# Altium PCB PCB_Main_Board_v2.0.PcbDoc (part 1 of 5)
Units mil, origin at the board's own origin, x right, y up, seen from the top; angles counter-clockwise.
Board outline 1967.5 x 1574.8 mil, 4 copper layers (Top Layer, Mid Layer 1, Mid Layer 2, Bottom Layer), stack 61.811 mil thick; 225 components, 129 nets, 854 pads, 286 vias.
Unrouted connection lines stored in the file: 2.
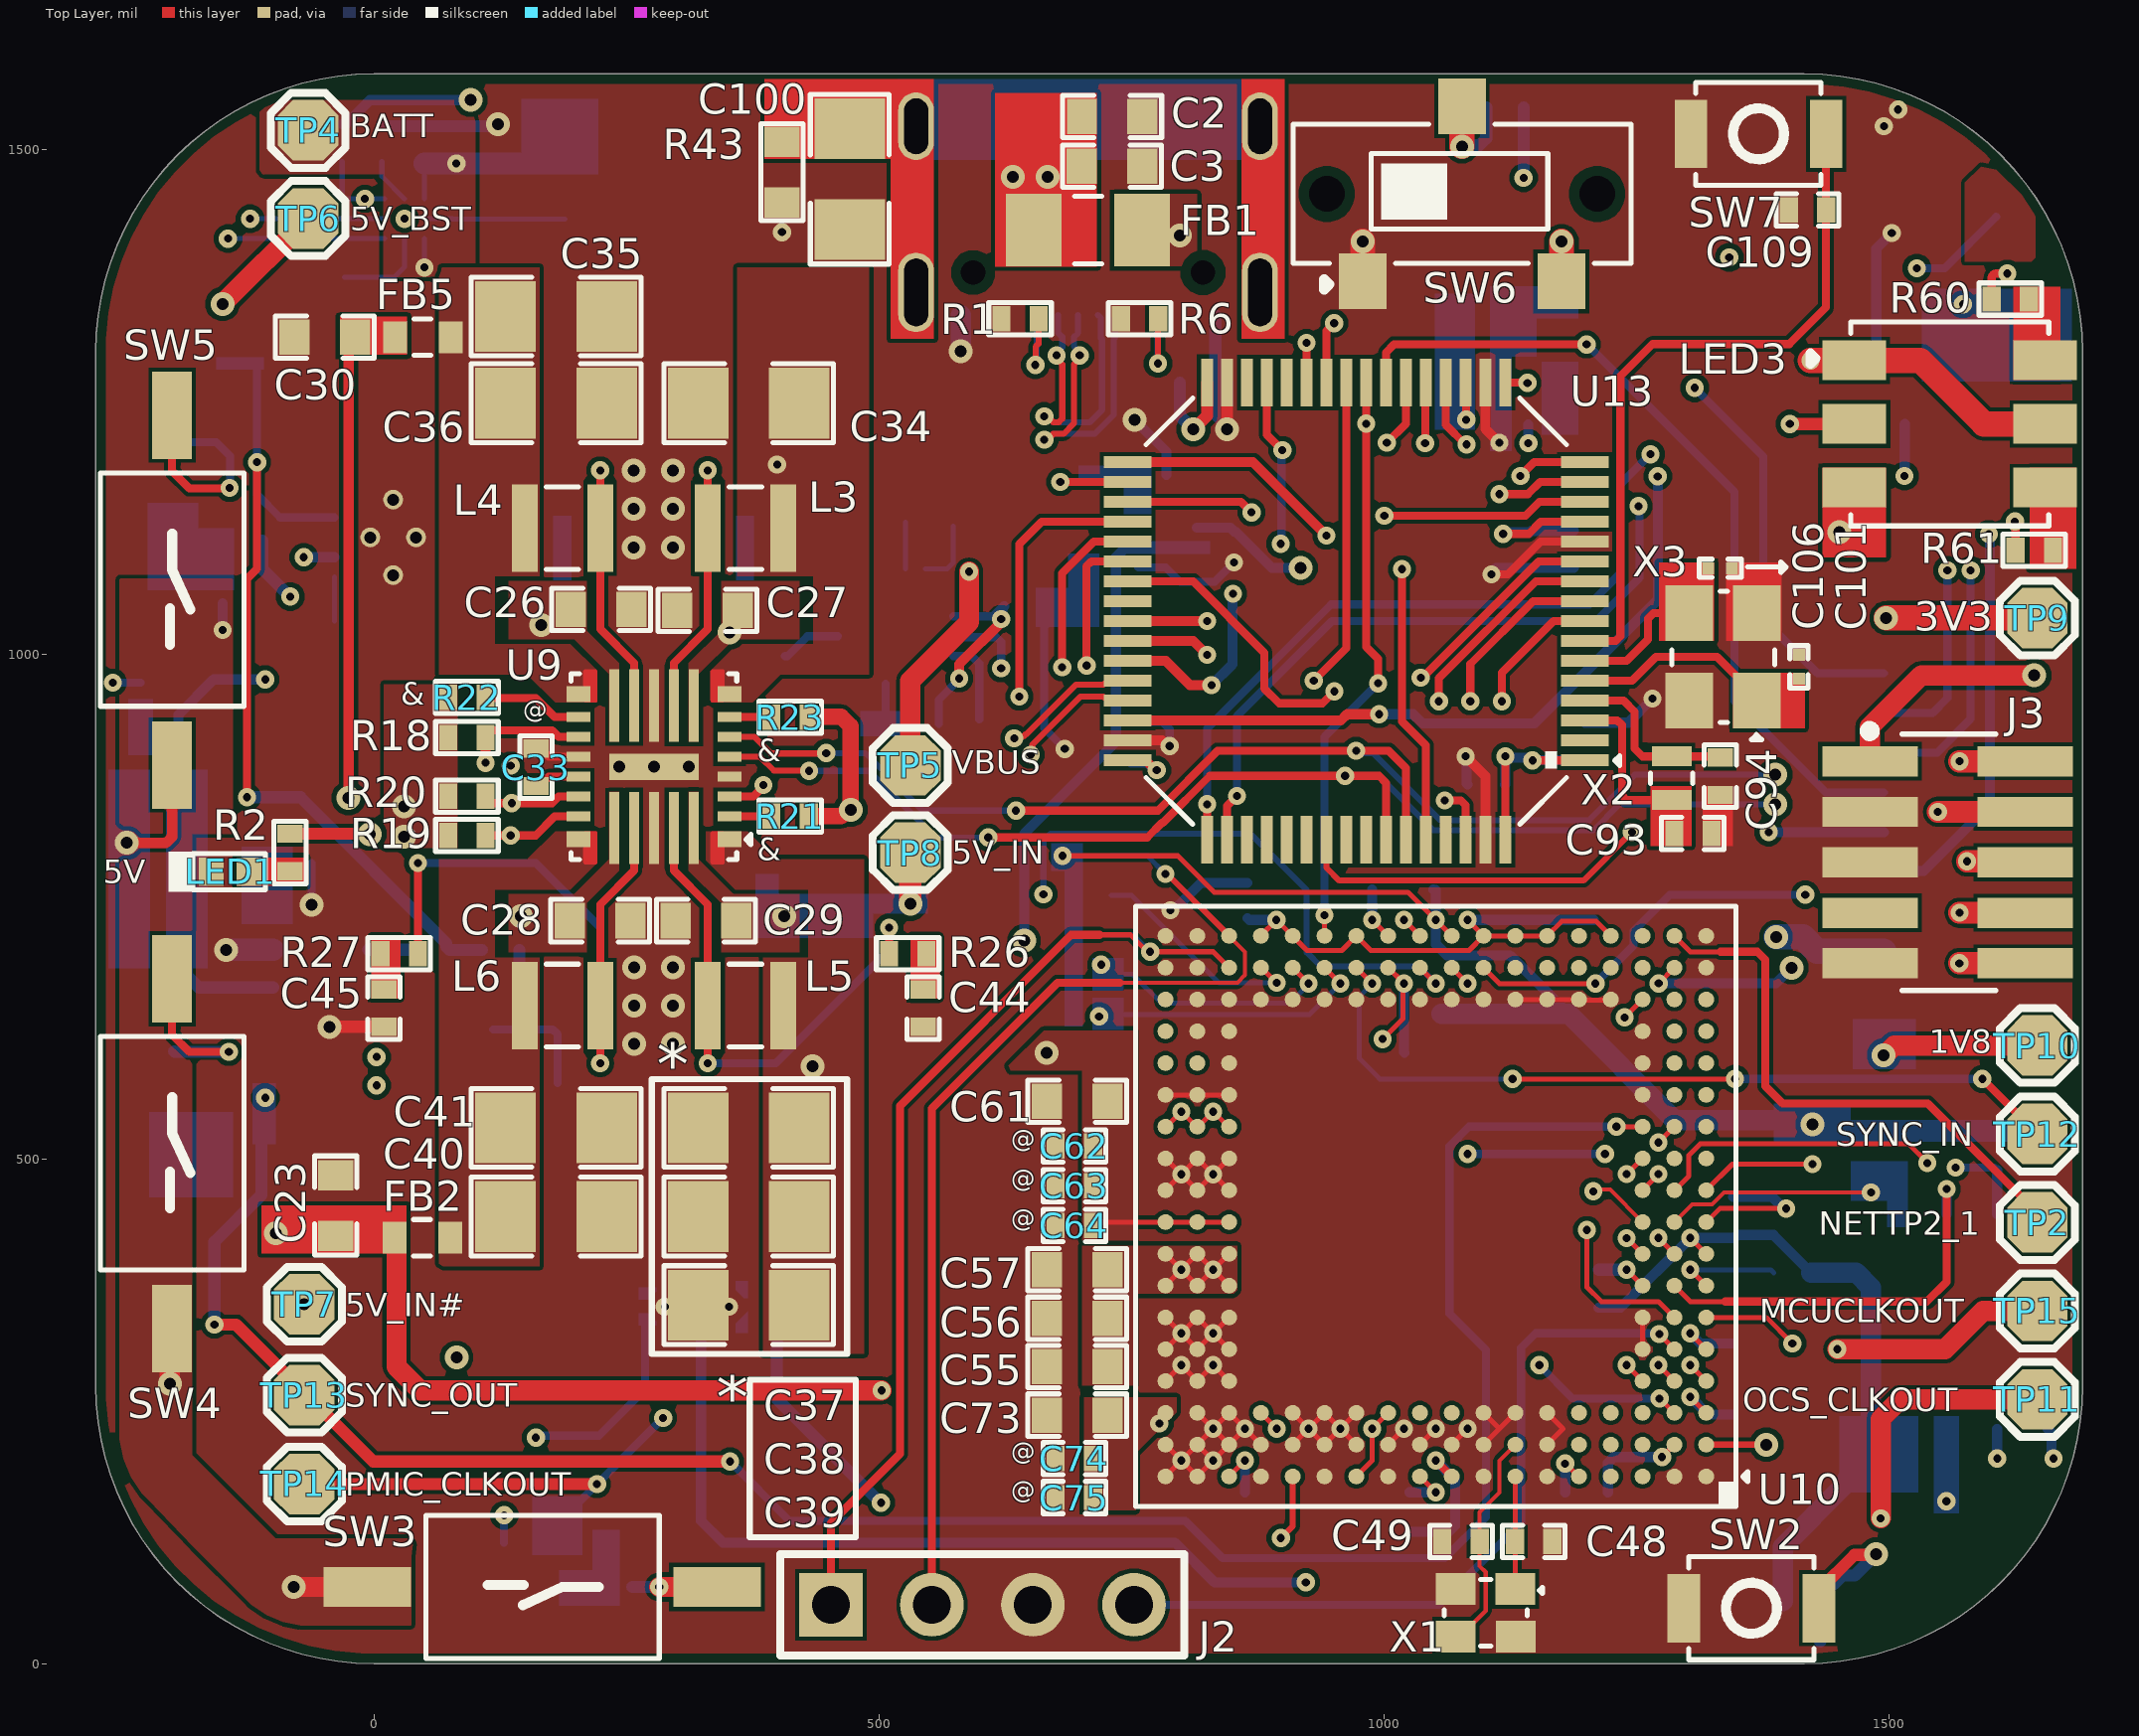
[diagram p0: Top Layer view]
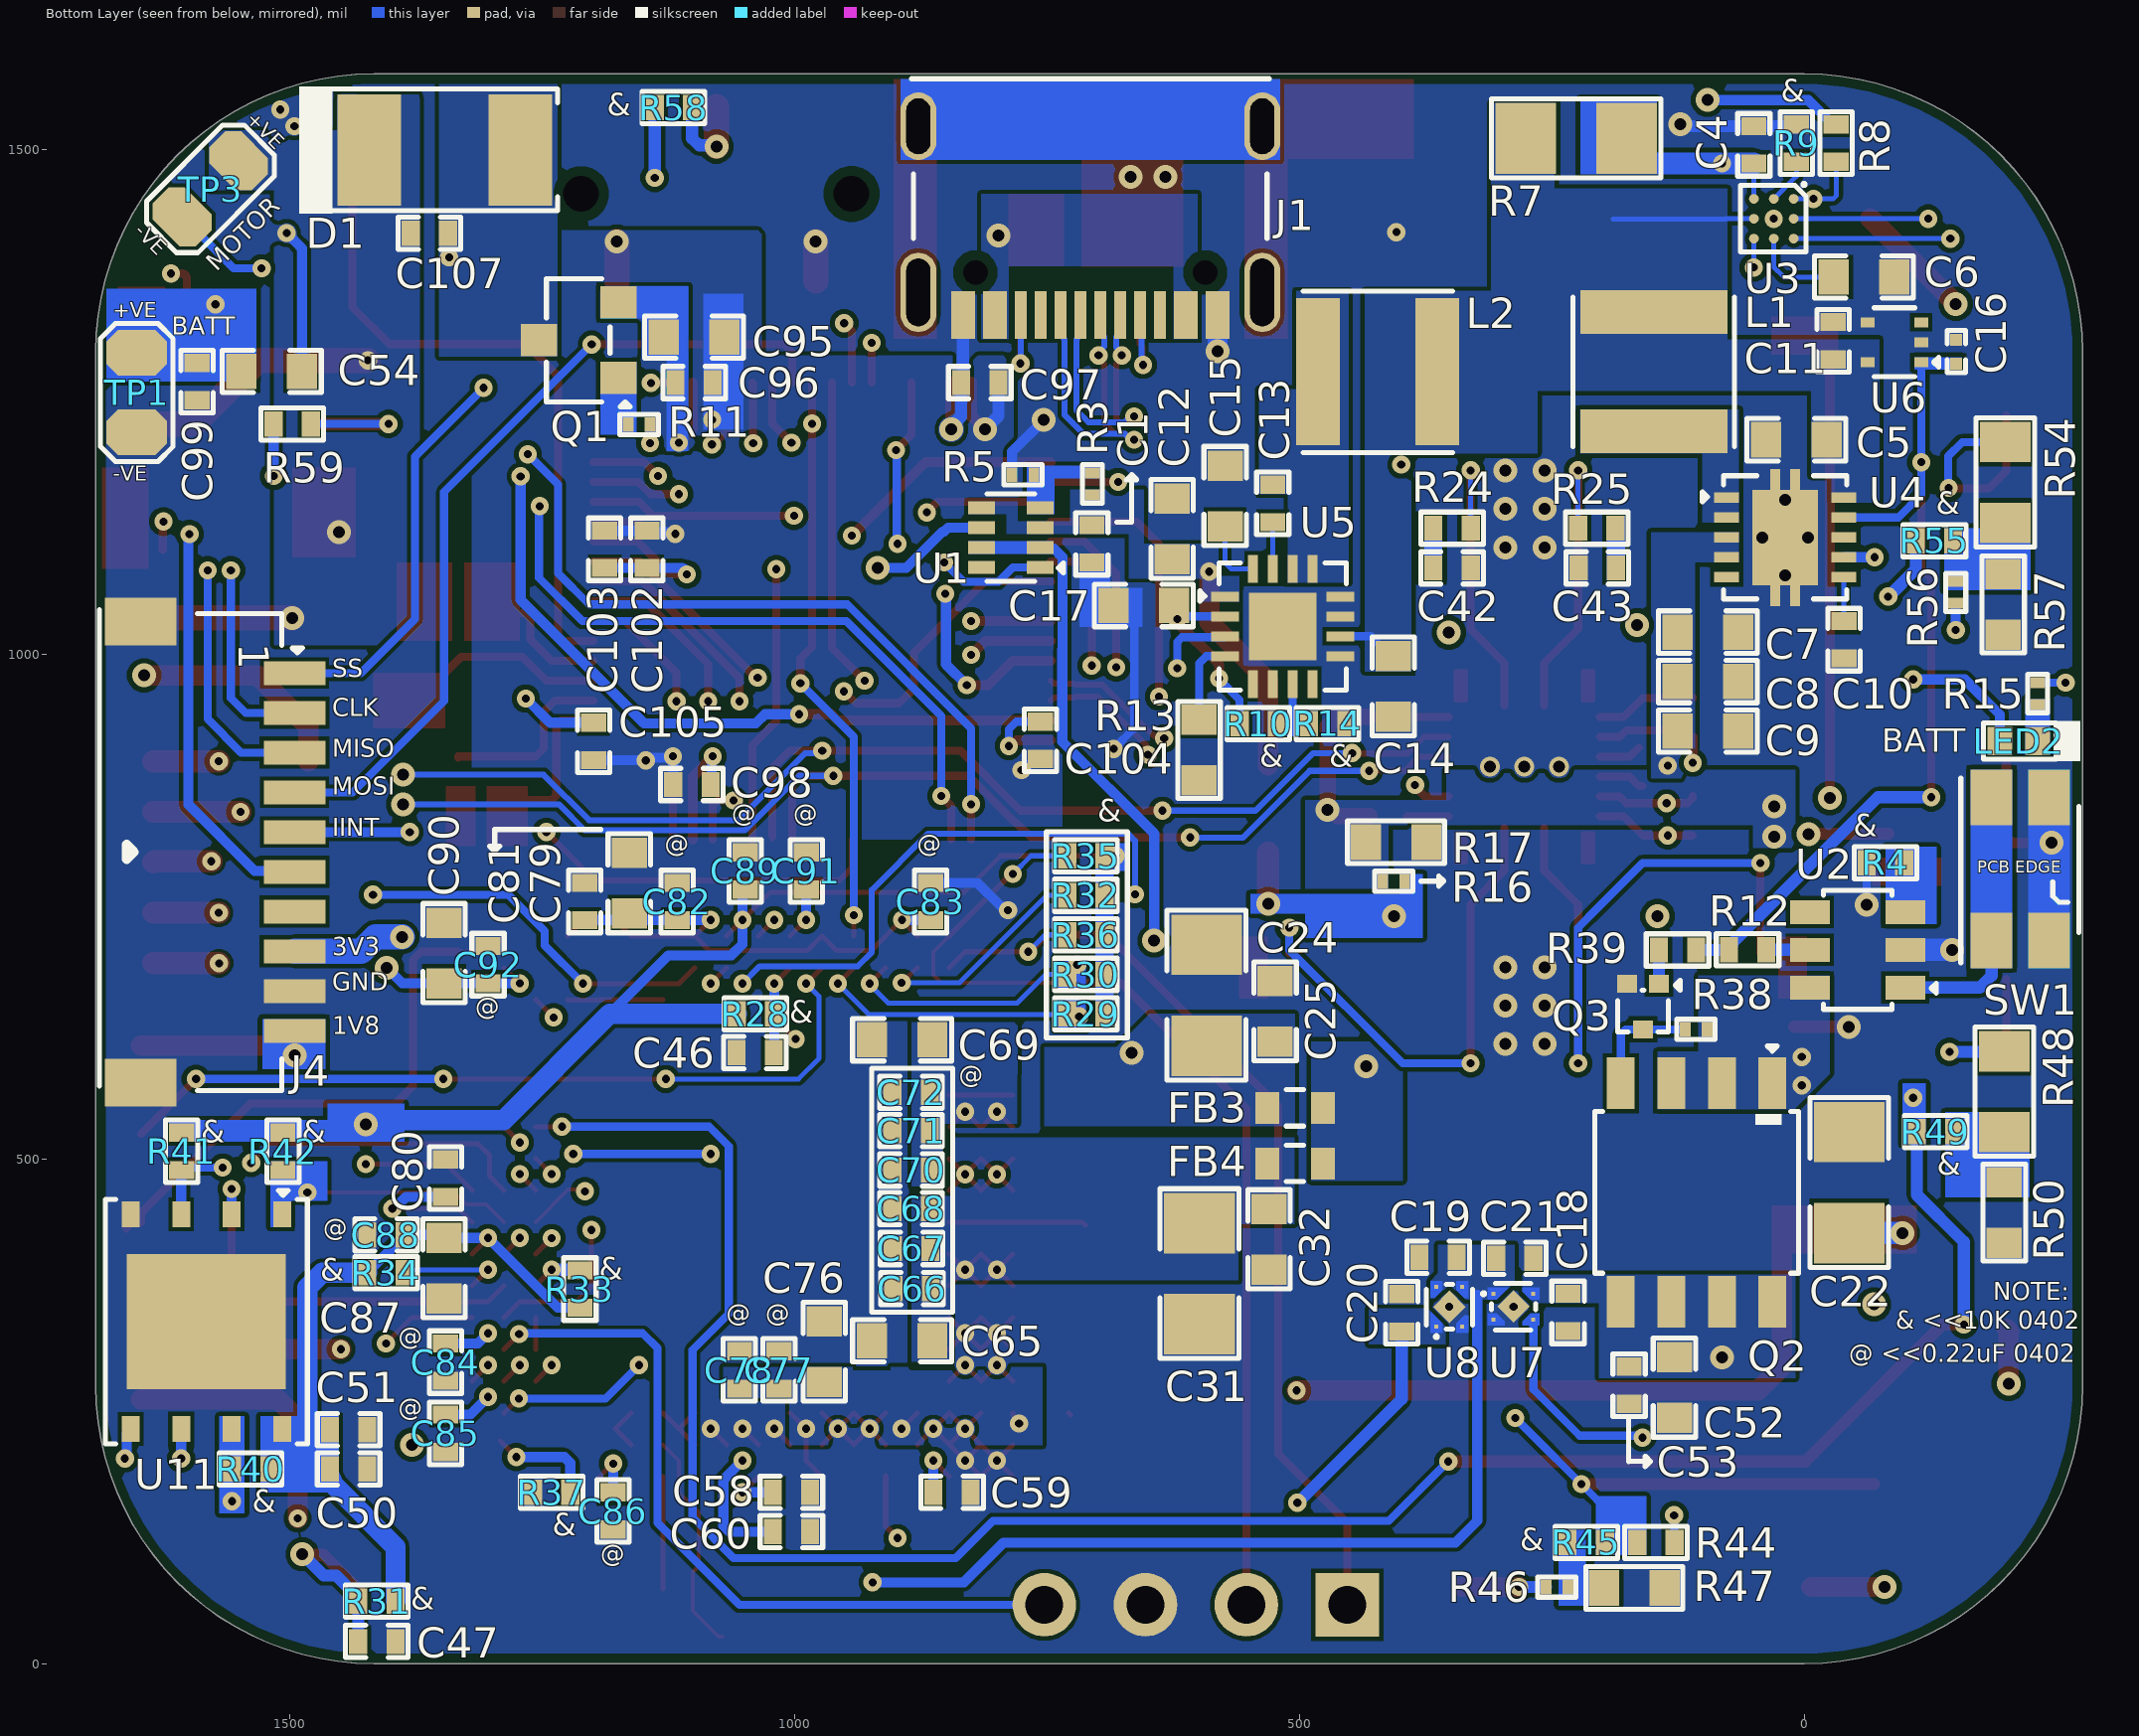
[diagram p1: Bottom Layer view, seen from below]
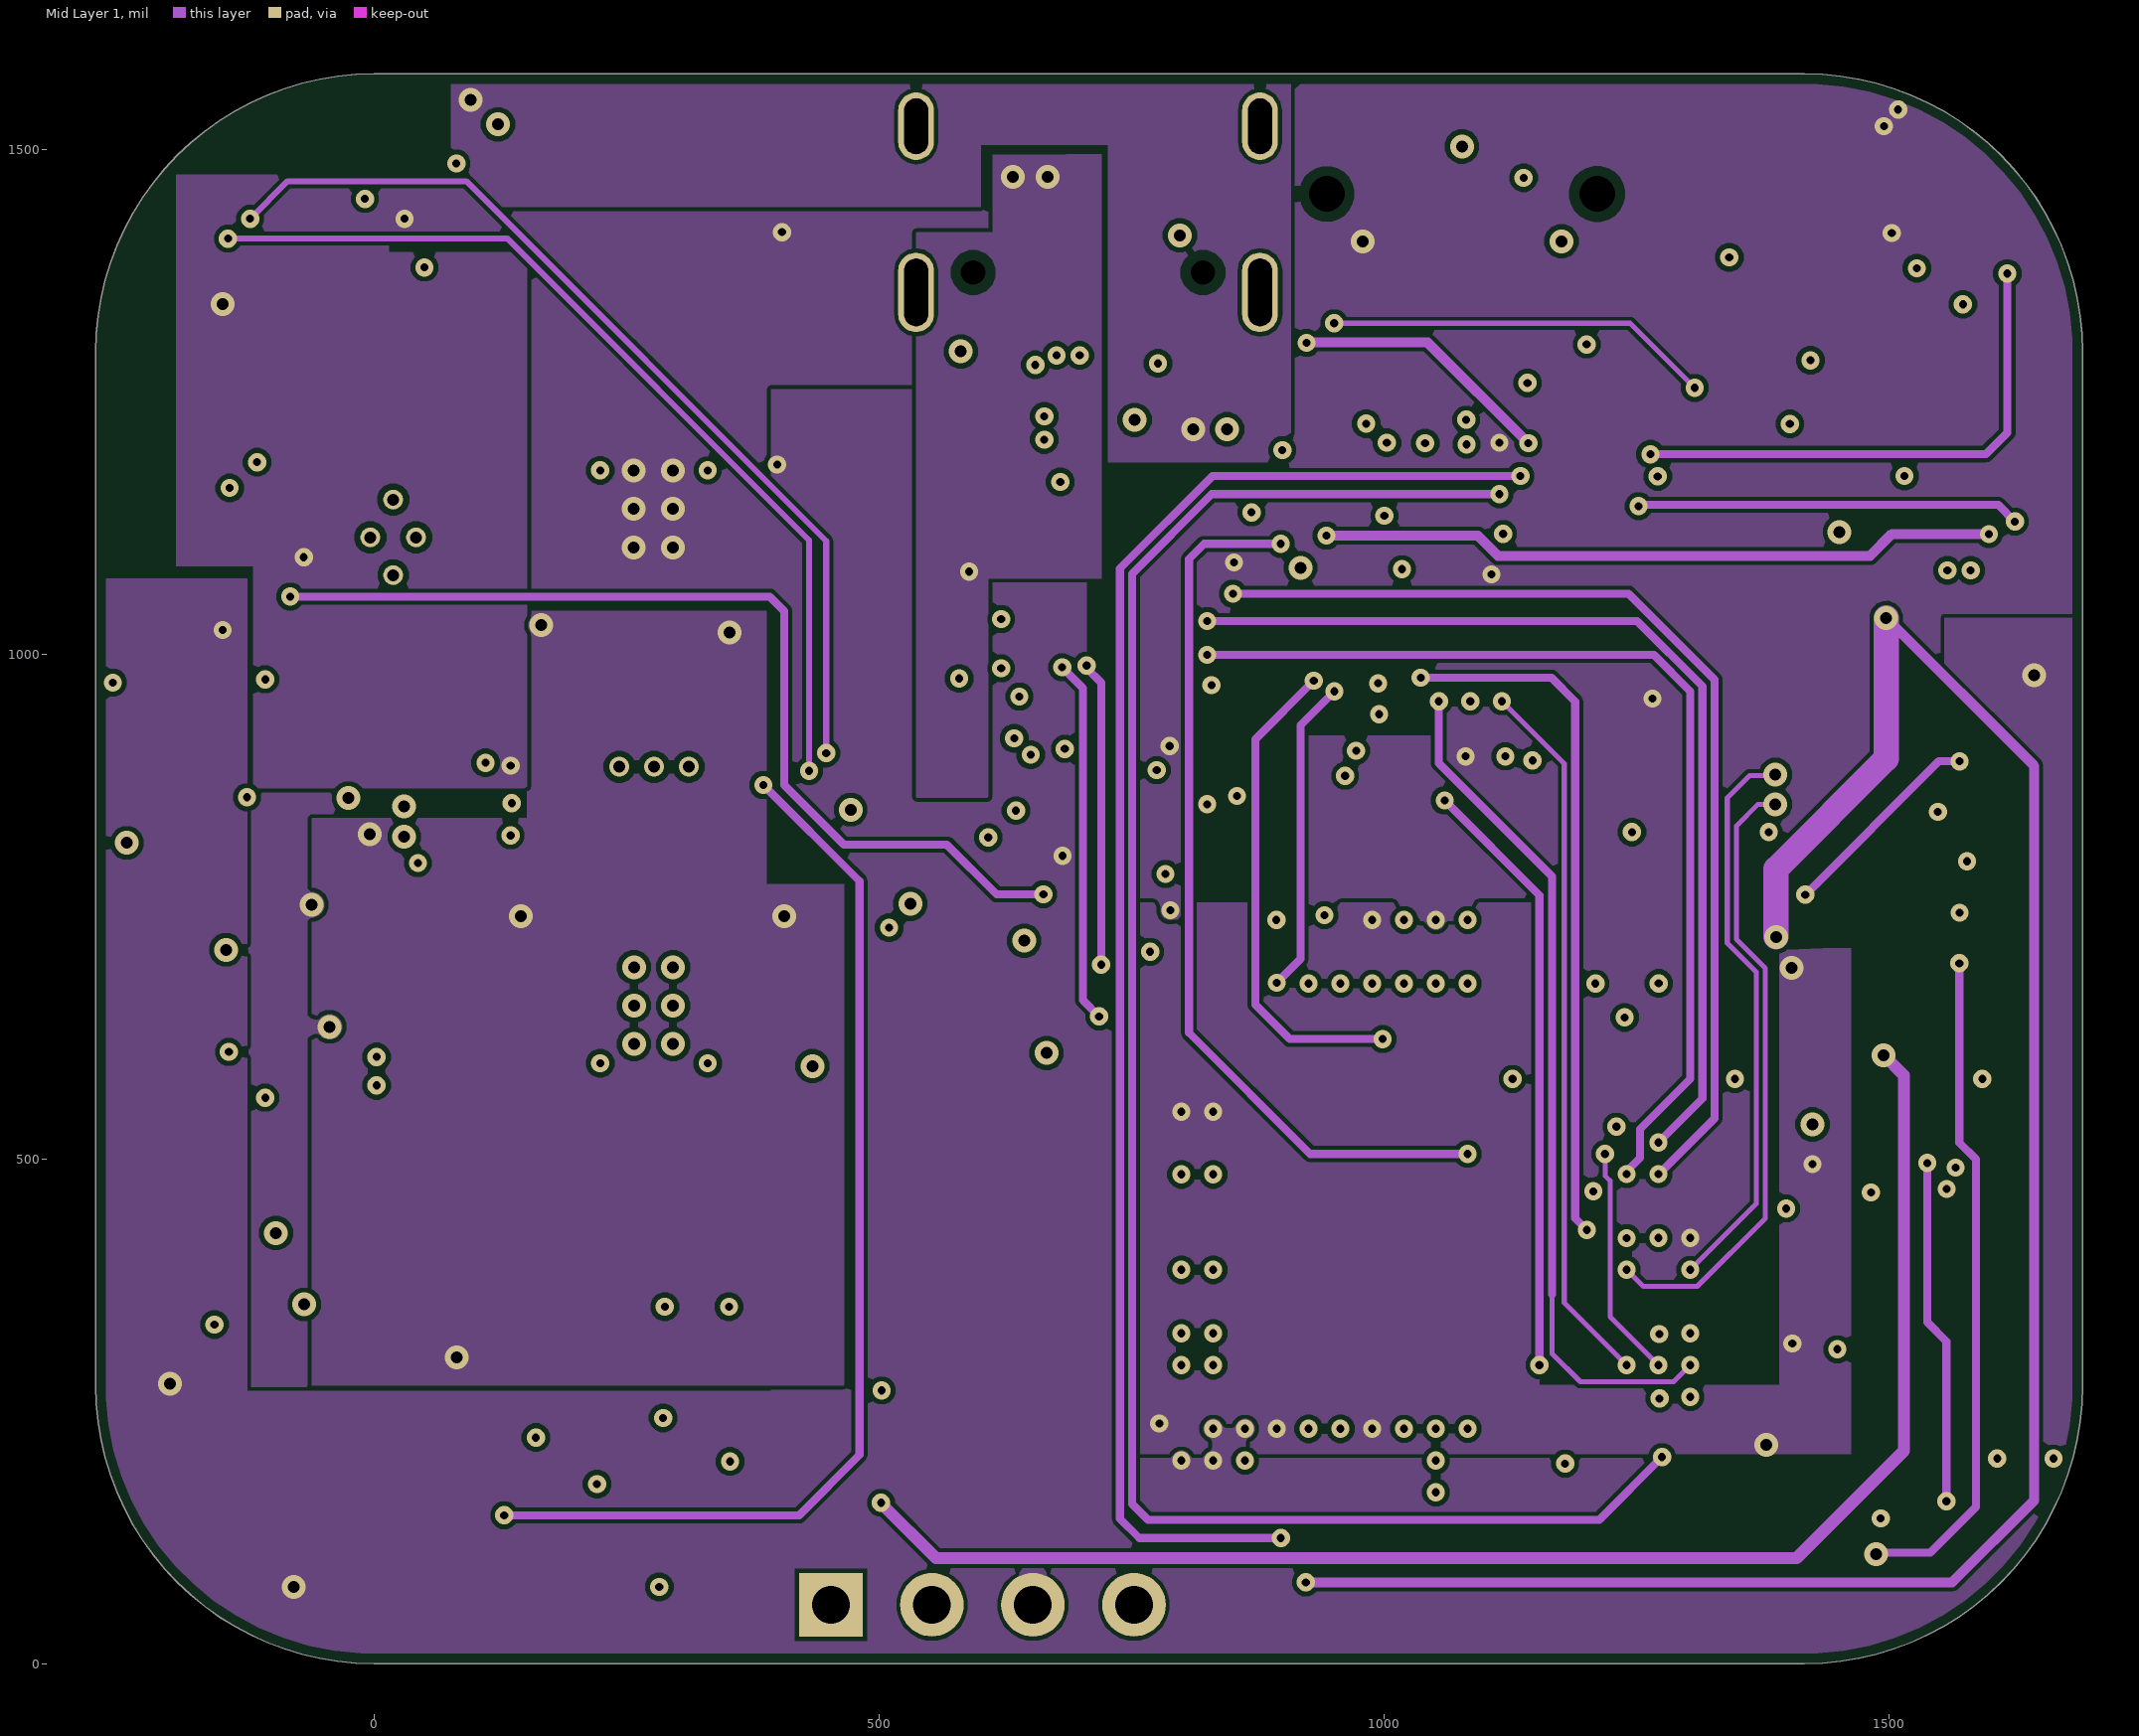
[diagram p2: Mid Layer 1]
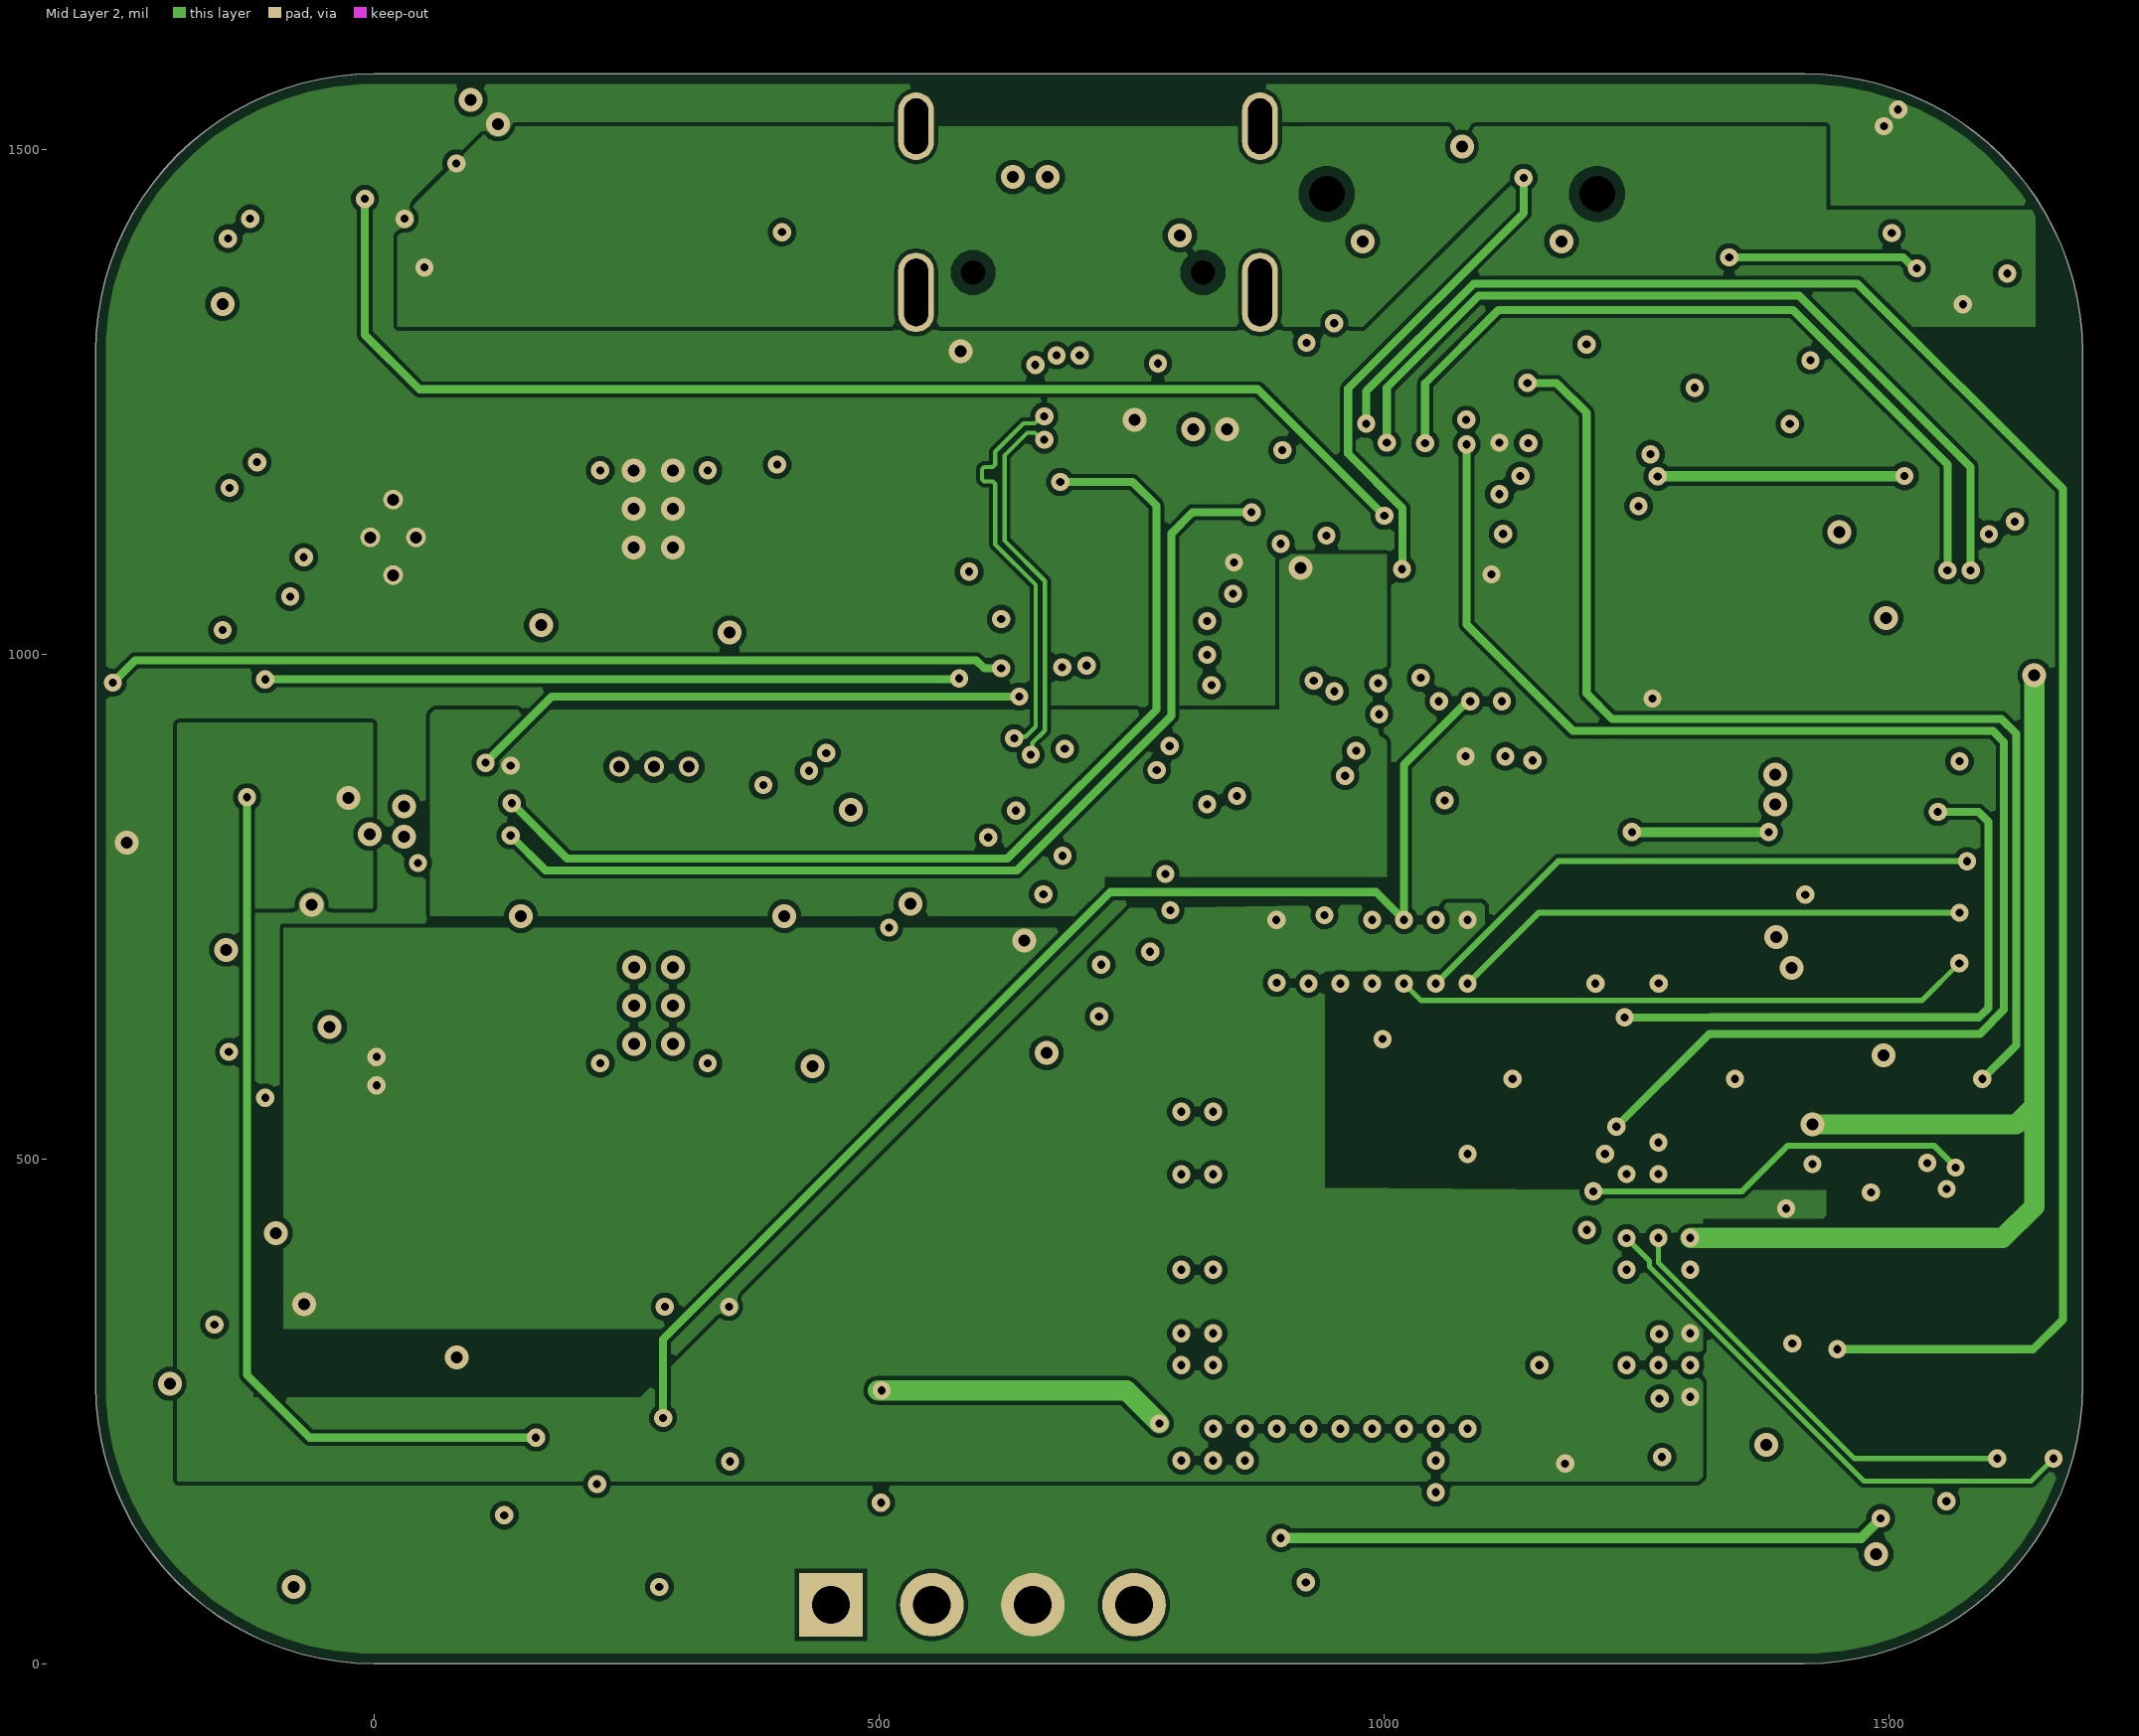
[diagram p3: Mid Layer 2]
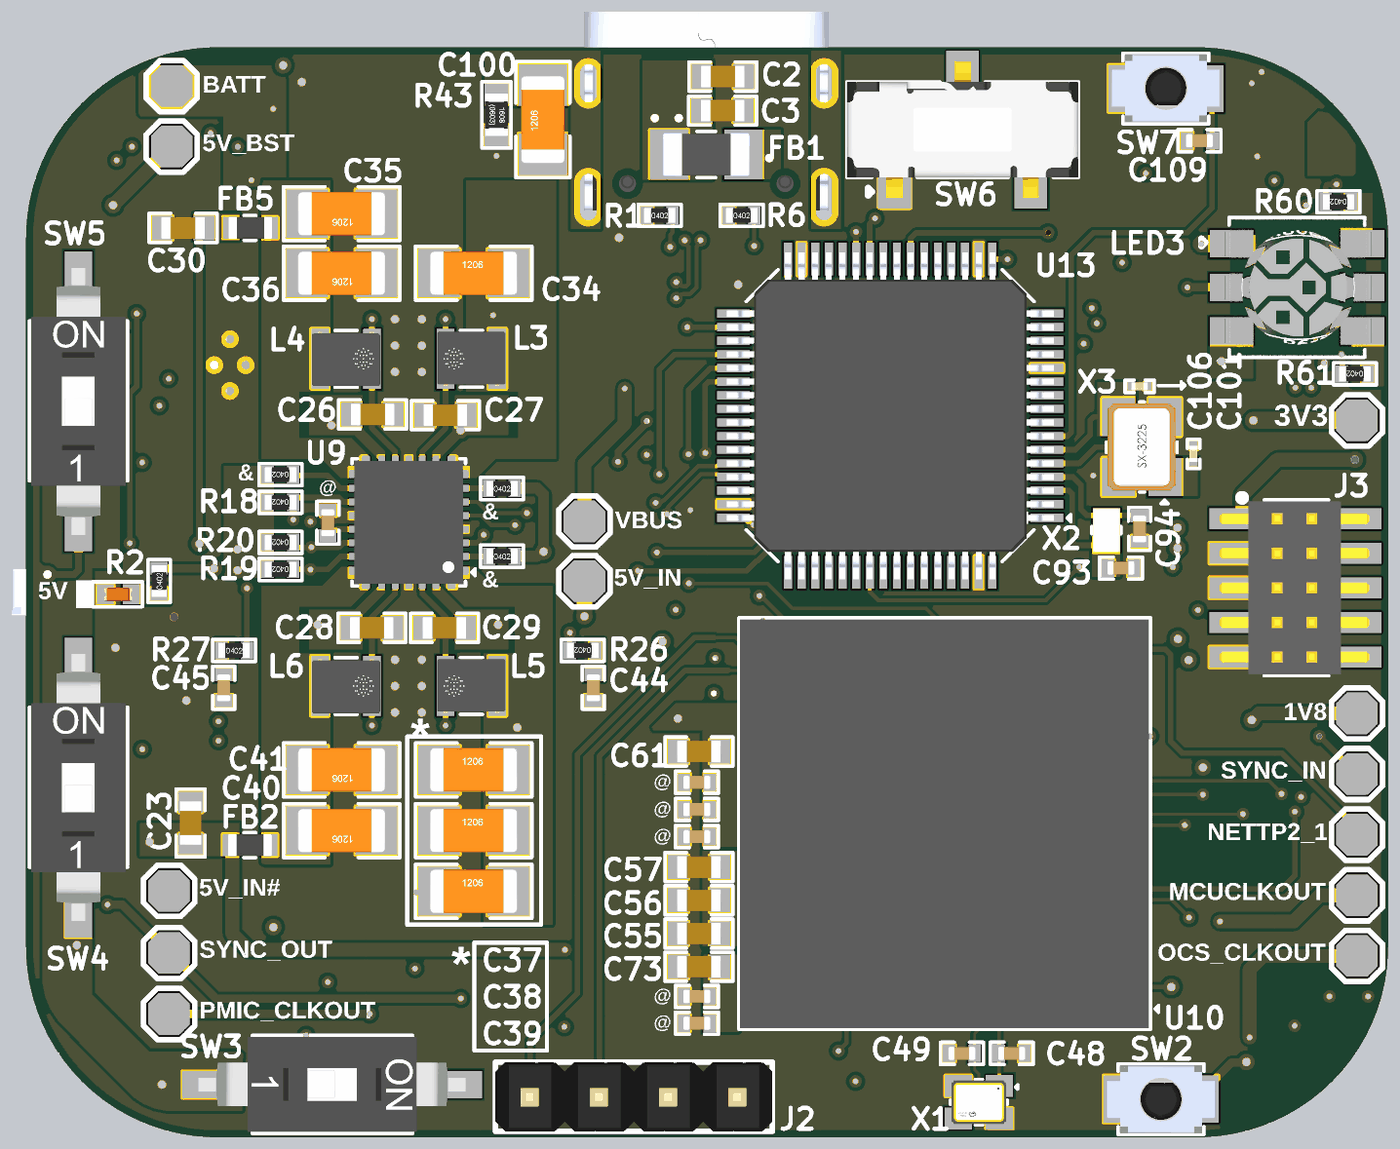
[diagram p6: 3D render of the assembled board from above, using the file's embedded part models]
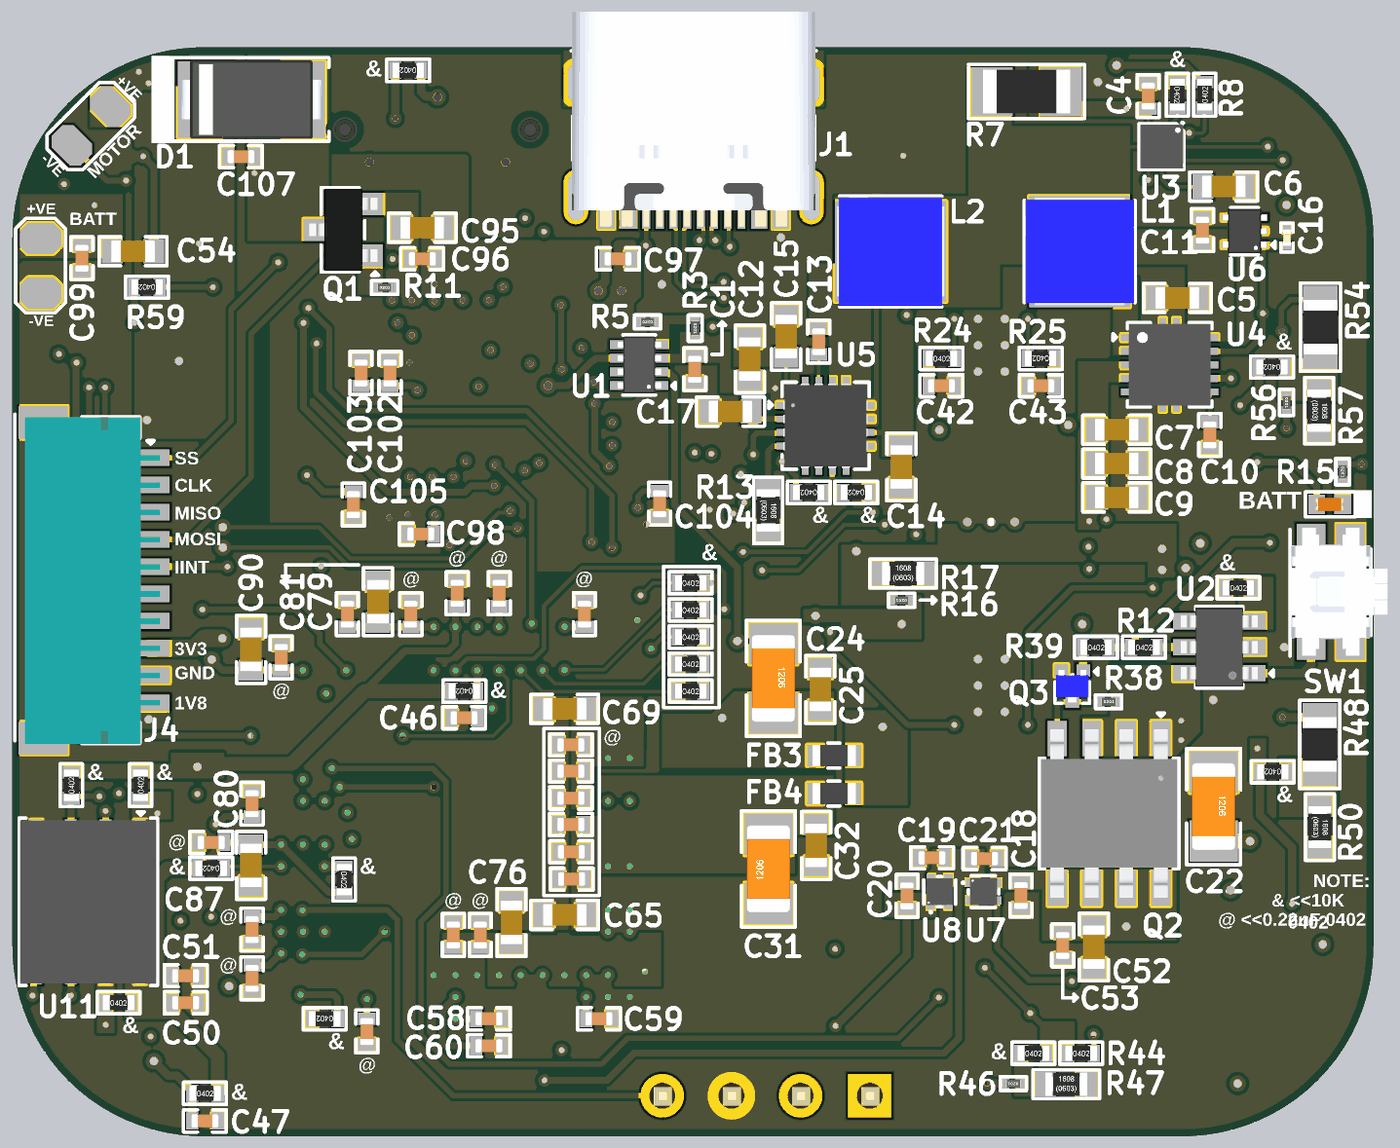
[diagram p7: 3D render of the assembled board from below, using the file's embedded part models]

## Layer stack, top to bottom
Top Solder: solder mask 0.5, Solder Resist, Dk 3.8
Top Layer: signal copper 1.378
Dielectric 1: prepreg 3.937, 2313, Dk 4.05
Mid Layer 1: signal copper 0.689
Core: core 49.803, FR-4, Dk 4.5
Mid Layer 2: signal copper 0.689
Dielectric 2: prepreg 3.937, 2313, Dk 4.05
Bottom Layer: signal copper 1.378
Bottom Solder: solder mask 0.5, Solder Resist, Dk 3.8

## Board outline
-0.01,0 cw(c-0.01,275.58) -275.59,275.58 -275.59,1299.21 cw(c0,1299.21) 0,1574.8 1416.32,1574.8 cw(c1416.32,1299.21) 1691.91,1299.21 1691.91,275.59 cw(c1416.32,275.59) 1416.32,0

## Design rules (kind name [scope] priority, off if disabled: settings)
BoardOutlineClearance [All] p1: gap=0 ignorepadtopadclearanceinfootprint=FALSE except(10: Poly-OutlineEdge)
Clearance [All] p1: gap=4 ignorepadtopadclearanceinfootprint=FALSE except(2: SMDPad-Hole; 5: Arc-Via Track-Via SMDPad-Via THPad-Via Via-Via Via-Fill Via-Poly Via-Region Via-Text; 9.84: Arc-Hole Track-Hole THPad-Hole Via-Hole Fill-Hole Poly-Hole Region-Hole Text-Hole)
ComponentClearance [All] p1: gap=4 collisioncheckmode=3 verticalgap=4 showdistances=TRUE
DiffPairsRouting [InDifferentialPairClass('USB_Lines')] p1: maxlimit=5.5 minlimit=5 mostfreqgap=5.5 toplayer_mingap=5.5 toplayer_minwidth=6 toplayer_maxwidth=6 toplayer_prefwidth=6 midlayer1_maxgap=5 midlayer1_prefgap=5 midlayer1_minwidth=4.2 midlayer1_maxwidth=4.2 midlayer1_prefwidth=4.2 midlayer2_maxgap=5 midlayer2_prefgap=5 midlayer2_minwidth=4.2 midlayer2_maxwidth=4.2 midlayer2_prefwidth=4.2 bottomlayer_mingap=5.5 bottomlayer_minwidth=6 bottomlayer_maxwidth=6 bottomlayer_prefwidth=6 impedanceprofiledriven=TRUE impedanceprofileid={D6A94453-DC50-4F1E-90A2-342E462EAD95} impedanceprofilevalue=90.000000 maxuncoupledlength=500
FanoutControl Fanout_BGA [IsBGA] p1: bgadir=In bgaviamode=Centered fanoutstyle=BGA fanoutdirection=Alternating viagrid=1 // Fanout_BGA (Default Rule)
Height [All] p1: minheight=0 maxheight=71497.94 prefheight=500
HoleSize [All] p1: absolutevalues=TRUE maxlimit=248.03 minlimit=7.87 maxpercent=80.000 minpercent=20.000
HoleToHoleClearance [All] p1: gap=2 allowstackedmicrovias=FALSE
MatchedLengths "Schematic Matched Net Lengths_1" [InNetClass('USB')] p1: tolerance=20 checknetsindiffpair=TRUE checkdiffpairvsdiffpair=FALSE checkxsignals=FALSE checkothers=FALSE
MaxMinImpedance "Schematic Impedance Constraint_1" [InNetClass('USB')] p1: minimum=88.00 maximum=90.00
MinimumAnnularRing [All] p1: minimumring=3
MinimumSolderMaskSliver [All] p1: minsoldermaskwidth=0
PlaneClearance [All] p1: clearance=4
PlaneConnect PlaneConnectPowerPads [InPadClass('PowerPads')] p1: planeconnectstyle=Direct reliefexpansion=20 reliefentries=4 reliefconductorwidth=10 reliefairgap=10
PlaneConnect [All] p2: pad.planeconnectstyle=Relief pad.reliefexpansion=11.81 pad.reliefentries=4 pad.reliefconductorwidth=4 pad.reliefairgap=4 via.planeconnectstyle=Direct via.reliefexpansion=11.81 via.reliefentries=4 via.reliefconductorwidth=5 via.reliefairgap=5
PolygonConnect PolygonConnectPowerPads [All vs (InPadClass('PowerPads'))] p1: connectstyle=Direct reliefconductorwidth=10 reliefentries=4 polygonreliefangle="90 Angle" airgapwidth=10
PolygonConnect [All] p2: connectstyle=Direct reliefconductorwidth=4 reliefentries=4 polygonreliefangle="90 Angle" airgapwidth=4
RoutingVias [All] p1: holewidth=8 width=18 viastyle="Through Hole" minholewidth=8 minwidth=18 maxholewidth=11.81 maxwidth=23.62
SilkToSilkClearance [All] p1: silktosilkclearance=0
SilkToSolderMaskClearance [IsPad] p1: minsilkscreentomaskgap=0 clearancetoexposedcopper=TRUE
SolderMaskExpansion [All] p1: expansion=2.95 istentingtop=FALSE
UnRoutedNet [All] p1: checkbadconnections=TRUE
Width USB_90 [InNetClass('USB')] p1: maxlimit=6.79 minlimit=5.29 preferedwidth=6.79 toplayer_minwidth=6.79 midlayer1_maxwidth=5.29 midlayer1_prefwidth=5.29 midlayer2_maxwidth=5.29 midlayer2_prefwidth=5.29 bottomlayer_minwidth=6.79 impedanceprofiledriven=TRUE impedanceprofileid={74898314-AE0B-42A0-BD47-88FFE63CDA06} impedanceprofilevalue=50.000000 minimp=50.000000 maximp=50.000000 favimp=50.000000
Width [All] p2: maxlimit=71497.94 minlimit=4 preferedwidth=5
18 further rules are at their usual default settings.

## Classes and differential pairs
component class U_System_Power_Sheet: C1 C2 C3 C4 C5 C6 C7 C8 C9 C10 C11 C12 C13 C14 C15 C16 C17 C18 C19 C20 C21 C52 C53 C54 C99 C100 FB1 J1 L1 L2 LED1 LED2 Q2 Q3 R1 R2 R3 R4 R5 R6 R7 R8 R9 R10 R12 R13 R14 R15 R38 R39 R43 SW1 TP1 TP4 TP5 TP6 TP7 TP8 TP9 TP10 U1 U2 U3 U4 U5 U6 U7 U8
component class U_Radar_Sheet2: C55 C56 C57 C58 C59 C60 C61 C62 C63 C64 C65 C66 C67 C68 C69 C70 C71 C72 C73 C74 C75 C76 C77 C78 C79 C80 C81 C82 C83 C84 C85 C86 C87 C88 C89 C90 C91 C92 TP2
component class U_Radar_Sheet1: C46 C47 C48 C49 C50 C51 J2 J3 R28 R29 R30 R31 R32 R33 R34 R35 R36 R37 R40 R41 R42 R44 R45 R46 R47 R48 R49 R50 R54 R55 R56 R57 SW2 SW3 SW4 SW5 TP11 TP12 TP13 TP14 TP15 U10 U11 X1
component class U_Radar_Power_Sheet: C22 C23 C24 C25 C26 C27 C28 C29 C30 C31 C32 C33 C34 C35 C36 C37 C38 C39 C40 C41 C42 C43 C44 C45 FB2 FB3 FB4 FB5 L3 L4 L5 L6 R16 R17 R18 R19 R20 R21 R22 R23 R24 R25 R26 R27 U9
component class U_Controller_Sheet: C93 C94 C95 C96 C97 C98 C101 C102 C103 C104 C105 C106 C107 C109 D1 J4 LED3 Q1 R11 R58 R59 R60 R61 SW6 SW7 TP3 U13 X2 X3
differential pair class USB_Lines: AR_USB USB
net class USB: USB_N USB_P
differential pair USB: +USB_P -USB_N

## Components (designator, comment, footprint, x,y, rotation, side; value= is the part's Value field where it differs from the comment)
C1 "0.1uF" Cap-0402 705.5,1109.27 r270 bottom locked value=100nF
C2 "10uF" Cap-0603 730.98,1532.65 r180 top
C3 "10uF" Cap-0603 730.62,1483.44 r180 top
C4 "1uF" Cap-0402 50,1504.5 r90 bottom locked
C5 "22uF" Cap-0603 7.92,1212.43 r180 bottom locked
C6 "2.2uF" CAP-0603 -59.08,1373.54 r0 bottom locked
C7 "22uF" Cap-0603 95.51,1021.85 r0 bottom locked
C8 "22uF" Cap-0603 95.51,972.85 r0 bottom locked
C9 "22uF" Cap-0603 95.51,923.85 r0 bottom locked
C10 "10nF" Cap-0402 -39.15,1014.35 r90 bottom locked
C11 "1uF" Cap-0402 -28.51,1310.46 r90 bottom locked
C12 "2.2uF" CAP-0603 625.94,1124.08 r90 bottom locked
C13 "47nF" Cap-0402 526.35,1149.24 r90 bottom locked
C14 "10uF" Cap-0603 406.95,968.03 r90 bottom locked
C15 "2.2uF" CAP-0603 573.51,1156.74 r90 bottom locked
C16 "1nF" CAP-0201 -150.51,1299.65 r270 bottom locked
C17 "2.2uF" CAP-0603 653.94,1048.08 r0 bottom locked
C18 "1uF" Cap-0402 234,347.99 r270 bottom locked
C19 "1uF" Cap-0402 362.69,402.62 r180 bottom locked
C20 "1uF" Cap-0402 398.69,347.62 r270 bottom locked
C21 "1uF" Cap-0402 286.66,401.49 r0 bottom locked
C22 "22uF" Cap-1206 -44.5,476.64 r270 bottom locked
C23 "10uF" Cap-0603 -38,454 r270 top locked
C24 "22uF" Cap-1206 592,662.16 r270 bottom
C25 "10uF" Cap-0603 524,646.16 r270 bottom
C26 "10uF" Cap-0603 225,1044.41 r180 top locked
C27 "10uF" Cap-0603 330,1043.41 r0 top locked
C28 "10uF" Cap-0603 223.82,736 r180 top locked
C29 "10uF" Cap-0603 328.82,736 r0 top locked
C30 "10uF" Cap-0603 -48.76,1314 r0 top locked
C31 "22uF" Cap-1206 599,386.53 r90 bottom locked
C32 "10uF" Cap-0603 530,420.53 r90 bottom locked
C33 "0.22uF" Cap-0402 160.44,887.91 r90 top locked
C34 "22uF" Cap-1206 371,1248.54 r0 top locked
C35 "22uF" Cap-1206 180.31,1334.54 r180 top locked
C36 "22uF" Cap-1206 180.31,1248.54 r180 top locked
C37 "22uF" Cap-1206 371,355.25 r0 top locked
C38 "22uF" Cap-1206 371,443 r0 top locked
C39 "22uF" Cap-1206 371,530.75 r0 top locked
C40 "22uF" Cap-1206 180.31,443 r180 top locked
C41 "22uF" Cap-1206 180.31,530.75 r180 top locked
C42 "390pF" Cap-0402 348.82,1085.45 r0 bottom locked
C43 "390pF" Cap-0402 205.1,1085.45 r180 bottom locked
C44 "390pF" Cap-0402 543.87,649.41 r90 top locked
C45 "390pF" Cap-0402 9.94,649.41 r90 top locked
C46 "0.1uF" Cap-0402 1038.96,605.2 r180 bottom locked value=100nF
C47 "0.1uF" Cap-0402 1413.5,22 r0 bottom value=100nF
C48 "4.7pF" Cap-0402 1148.3,121.1 r180 top locked
C49 "4.7pF" Cap-0402 1076.3,121.1 r0 top locked
C50 "1uF" Cap-0402 1441.5,193 r0 bottom locked
C51 "0.1uF" Cap-0402 1441.5,232 r0 bottom locked value=100nF
C52 "10uF" Cap-0603 128.66,273.49 r90 bottom locked
C53 "0.1uF" Cap-0402 173.5,275.86 r270 bottom locked value=100nF
C54 "10uF" Cap-0603 1517.57,1279.97 r0 bottom
C55 "2.2uF" CAP-0603 696.46,294.26 r0 top locked
C56 "2.2uF" CAP-0603 696.46,342.26 r0 top locked
C57 "10uF" Cap-0603 696.46,390.27 r0 top locked
C58 "1uF" Cap-0402 1002.97,169.79 r0 bottom locked
C59 "47nF" Cap-0402 843.99,169.79 r0 bottom locked
C60 "1uF" Cap-0402 1002.97,130.79 r0 bottom locked
C61 "10uF" Cap-0603 696.46,557.26 r0 top locked
C62 "0.22uF" Cap-0402 693.46,512.76 r0 top locked
C63 "0.22uF" Cap-0402 693.46,473.51 r0 top locked
C64 "0.22uF" Cap-0402 693.46,434.26 r0 top locked
C65 "10uF" Cap-0603 893.47,320.03 r180 bottom locked
C66 "0.22uF" Cap-0402 883.48,371.76 r180 bottom locked
C67 "0.22uF" Cap-0402 883.98,411.26 r180 bottom locked
C68 "0.22uF" Cap-0402 884.48,450.76 r180 bottom locked
C69 "10uF" Cap-0603 893.47,618 r180 bottom locked
C70 "0.22uF" Cap-0402 884.48,489.02 r180 bottom locked
C71 "0.22uF" Cap-0402 884.48,528.02 r180 bottom locked
C72 "0.22uF" Cap-0402 884.48,566.02 r180 bottom locked
C73 "10uF" Cap-0603 696.46,246.26 r0 top locked
C74 "0.22uF" Cap-0402 693.46,203.29 r0 top locked
C75 "0.22uF" Cap-0402 693.46,164.67 r0 top locked
C76 "10uF" Cap-0603 970.46,309.03 r270 bottom locked
C77 "0.22uF" Cap-0402 1015.46,291.03 r270 bottom locked
C78 "0.22uF" Cap-0402 1054.46,291.03 r270 bottom locked
C79 "0.1uF" Cap-0402 1207.62,755 r270 bottom value=100nF
C80 "0.1uF" Cap-0402 1345.5,481 r270 bottom locked value=100nF
C81 "2.2uF" CAP-0603 1163.55,773 r270 bottom
C82 "0.22uF" Cap-0402 1116,755 r270 bottom
C83 "0.22uF" Cap-0402 865,755 r270 bottom
C84 "0.22uF" Cap-0402 1345.5,298.78 r90 bottom locked
C85 "0.22uF" Cap-0402 1345.5,228.29 r90 bottom locked
C86 "0.22uF" Cap-0402 1179.5,151.3 r90 bottom
C87 "2.2uF" CAP-0603 1347,391.62 r90 bottom locked
C88 "0.22uF" Cap-0402 1404.5,424.76 r180 bottom locked
C89 "0.22uF" Cap-0402 1048.89,785.28 r270 bottom
C90 "10uF" Cap-0603 1347,704 r270 bottom locked
C91 "0.22uF" Cap-0402 988.22,785.28 r270 bottom
C92 "0.22uF" Cap-0402 1303.43,692.5 r270 bottom locked
C93 "19pF" Cap-0402 1306,822.4 r0 top locked
C94 "19pF" Cap-0402 1333,879.06 r270 top locked
C95 "4.7uF" Cap-0603 1099.39,1314.03 r180 bottom
C96 "0.1uF" Cap-0402 1099.39,1268.99 r180 bottom locked value=100nF
C97 "0.1uF" Cap-0402 816.48,1268.99 r180 bottom value=100nF
C98 "0.1uF" Cap-0402 1101.48,870.87 r0 bottom locked value=100nF
C99 "0.1uF" Cap-0402 1591.38,1269.97 r270 bottom value=100nF
C100 "4.7nF" Cap-1206 471,1470.4 r90 top locked
C101 "18pF" CAP-0201 1411,987.4 r270 top locked
C102 "1uF" Cap-0402 1146,1103.9 r270 bottom locked
C103 "10nF" Cap-0402 1188,1103.9 r90 bottom locked
C104 "0.1uF" Cap-0402 756.24,914.66 r270 bottom value=100nF
C105 "0.1uF" Cap-0402 1199,913.57 r270 bottom locked value=100nF
C106 "18pF" CAP-0201 1333,1085.01 r180 top locked
C107 "0.1uF" Cap-0402 1361.5,1416.83 r0 bottom value=100nF
C109 "0.1uF" Cap-0402 1419.5,1440 r0 top locked value=100nF
D1 "1N4001" SMA(DO-214AC) 1346.36,1499.46 r180 bottom
FB1 "100MHz" IND-1206 707,1420 r180 top
FB2 "100MHz" "IND-0603 (1608 Metric)" 48,422 r180 top locked
FB3 "100MHz" "IND-0603 (1608 Metric)" 504,550.53 r0 bottom locked
FB4 "100MHz" "IND-0603 (1608 Metric)" 504,495.53 r0 bottom locked
FB5 "100MHz" "IND-0603 (1608 Metric)" 48.44,1314 r180 top locked
J1 "TYPE-C-31-M-12" TYPE-C-31-M-12_ 707,1429.4 r0 bottom locked
J2 "B-2100S04P-A110" HDR1X4_ 452.5,58.4 r0 top locked
J3 "20021121-00010C4LF" 20021121-00010C4LF_ 1558.06,793.85 r270 top locked
J4 "SM10B-SRSS-TB(LF)(SN)" SM10B-SRSS-TB(LF)(SN) 1571.28,804.09 r270 bottom locked
L1 "1uH" WPN4020H1R0MT_ 149.11,1279.59 r270 bottom locked
L2 "1uH" WPN4020H1R0MT_ 422.43,1279.59 r180 bottom locked
L3 "470 nH" "IND-1008 (2520 Metric)" 367.82,1124.82 r0 top locked value=470nH
L4 "470 nH" "IND-1008 (2520 Metric)" 186.6,1124.82 r180 top locked value=470nH
L5 "470 nH" "IND-1008 (2520 Metric)" 367.82,652 r0 top locked value=470nH
L6 "470 nH" "IND-1008 (2520 Metric)" 186.6,652 r180 top locked value=470nH
LED1 "XZVG68W-2" LED-0402 -142.5,784.57 r180 top locked
LED2 "RED" LED-0402 -212.3,914 r180 bottom locked
LED3 "MHP5050RGBDT" SMD5050 1560.38,1228 r0 top locked
Q1 "MMBT2222A-7-F" SOT-23 1213.63,1311 r90 bottom locked
Q2 "IRF7410TRPBF" SOP-8 106.66,466.72 r270 bottom locked
Q3 "MMBT3904M" SOT-723 159.75,650.96 r0 bottom locked
R1 "5.1K" Res-0402 639.68,1332.11 r0 top locked
R2 "510R" Res-0402 -83.26,803.57 r90 top locked
R3 "1K" Res-0201 705.01,1168.7 r270 bottom locked value=1kR
R4 "10K" Res-0402 -80.26,793.21 r180 bottom locked
R5 "1K" Res-0201 773.74,1177.7 r180 bottom locked value=1kR
R6 "5.1K" Res-0402 758.12,1332.11 r0 top locked
R7 "10mR" Res-1206 225.9,1510.91 r0 bottom
R8 "5.1K" Res-0402 -31.56,1506.27 r90 bottom locked
R9 "10K" Res-0402 7.81,1506.27 r270 bottom locked
R10 "10K" Res-0402 540.69,930.98 r0 bottom locked
R11 "1K" Res-0201 1153.85,1227.39 r180 bottom locked value=1kR
R12 "4.7K" Res-0402 56.16,707.21 r180 bottom locked
R13 "20K" Res-0603 599.3,905.16 r90 bottom locked
R14 "10K" Res-0402 472.11,930.98 r0 bottom locked
R15 "1K" Res-0201 -231,961 r270 bottom locked value=1kR
R16 "1K" Res-0201 406.48,775.01 r0 bottom locked value=1kR
R17 "1.96K" Res-0603 404.31,813.78 r0 bottom locked value=1.96kR
R18 "4.7K" Res-0402 91.94,917.41 r180 top locked
R19 "4.7K" Res-0402 91.94,820.41 r180 top locked
R20 "4.7K" Res-0402 91.94,859.41 r180 top locked
R21 "10K" Res-0402 411.94,839.54 r0 top locked
R22 "10K" Res-0402 91.94,957.41 r180 top locked
R23 "10K" Res-0402 411.94,937.41 r0 top locked
R24 "3.83R" Res-0402 348.82,1124.82 r180 bottom locked
R25 "3.83R" Res-0402 205.5,1124.82 r0 bottom locked
R26 "3.83R" Res-0402 528.5,703.41 r180 top locked
R27 "3.83R" Res-0402 24.94,703.41 r0 top locked
R28 "10K" Res-0402 1038.67,643.64 r0 bottom locked
R29 "10K" Res-0402 711.5,643.74 r180 bottom locked
R30 "10K" Res-0402 711.5,682.88 r180 bottom locked
R31 "10K" Res-0402 1413.5,62 r180 bottom
R32 "10K" Res-0402 711.5,761.15 r180 bottom locked
R33 "10K" Res-0402 1212.43,371.12 r270 bottom
R34 "10K" Res-0402 1404.5,387.27 r0 bottom
R35 "10K" Res-0402 711.5,800.28 r180 bottom locked
R36 "10K" Res-0402 711.5,722 r180 bottom locked
R37 "10K" Res-0402 1240.44,169.79 r0 bottom locked
R38 "1K" Res-0201 107.17,628.32 r180 bottom locked value=1kR
R39 "4.7K" Res-0402 125.5,707 r180 bottom locked
R40 "10K" Res-0402 1538.5,193 r180 bottom locked
R41 "10K" Res-0402 1606.78,507.58 r90 bottom locked
R42 "10K" Res-0402 1506.63,507.58 r90 bottom locked
R43 "1M" Res-0603 404,1477.4 r90 top locked
R44 "0R" Res-0402 147,120 r180 bottom locked
R45 "10K" Res-0402 216,120 r180 bottom locked
R46 "7.87k" Res-0201 245,76 r0 bottom locked
R47 "82K" Res-0603 168.46,75.09 r0 bottom locked
R48 "750R" RES-0805 -197.93,566.61 r90 bottom locked
R49 "10K" Res-0402 -130,527 r0 bottom locked
R50 "82K" Res-0603 -198,447 r90 bottom locked
R54 "750R" RES-0805 -199,1170.11 r90 bottom locked
R55 "10K" Res-0402 -128.93,1112.41 r0 bottom locked
R56 "7.87k" Res-0201 -149.93,1061.21 r270 bottom locked
R57 "82K" Res-0603 -197,1049.41 r90 bottom locked
R58 "10K" Res-0402 1119.85,1541.52 r0 bottom locked
R59 "80.6R" Res-0402 1497.39,1228 r0 bottom locked
R60 "280R" Res-0402 1620.31,1351.69 r180 top
R61 "80.6R" Res-0402 1644,1103 r180 top
SW1 "EVQ-P7A01P" EVQP7A01P -214,787.4 r90 bottom locked
SW2 "B3U-1000P" B3U-1000P 1364,55 r0 top locked
SW3 "DSIC01LSGET" DSIC01LSGET 166.46,76.09 r180 top locked
SW4 "DSIC01LSGET" DSIC01LSGET -199.93,505.24 r270 top locked
SW5 "DSIC01LSGET" DSIC01LSGET -199.93,1063.4 r270 top locked
SW6 "CL-SB-12B-02T" CL-SB-12B-02T 1077.35,1455.9 r0 top
SW7 "B3U-1000P" B3U-1000P 1370.93,1515.4 r180 top locked
TP1 "2 Test Pad" "2 Test Pad" 1651.31,1298.47 r270 bottom
TP2 "TEST POINT" Test-point 1647.09,437.11 r0 top locked
TP3 "2 Test Pad" "2 Test Pad" 1550.56,1488.75 r315 bottom
TP4 "TEST POINT" Test-point -65.22,1518.84 r0 top locked
TP5 "TEST POINT" Test-point 531,889.81 r0 top locked
TP6 "TEST POINT" Test-point -65.22,1431.63 r0 top locked
TP7 "TEST POINT" Test-point -69,356 r0 top locked
TP8 "TEST POINT" Test-point 531,803.41 r0 top locked
TP9 "TEST POINT" Test-point 1647.09,1035.81 r0 top locked
TP10 "TEST POINT" Test-point 1647.09,612.36 r90 top locked
TP11 "TEST POINT" Test-point 1647.09,261.85 r90 top locked
TP12 "TEST POINT" Test-point 1647.09,524.73 r90 top locked
TP13 "TEST POINT" Test-point -69,266.18 r90 top locked
TP14 "TEST POINT" Test-point -69,178 r90 top locked
TP15 "TEST POINT" Test-point 1647.09,349.48 r90 top locked
U1 "TPS2117DRLR" SOT-583 785.75,1115.45 r0 bottom locked
U2 "MAX16054AZT+T" TSOT-23-6 -52.76,707.21 r0 bottom locked
U3 "BQ27426YZFR" "DSBGA-9 (1.651x1.61)" 30.27,1431.27 r270 bottom locked
U4 "TPS61232DRCR" "10-VSON (3x3)" 18.92,1115.7 r180 bottom locked
U5 "BQ25302RTER" "16-QFN (3x3)." 516.43,1027.55 r180 bottom locked
U6 "BD4830FVE-TR" 5-VSOF -89.21,1309.08 r0 bottom locked
U7 "NCP167BMX330TBG" "4-UDFN (1.0x1.0)" 307.66,366.49 r270 bottom locked
U8 "NCP161BMX180TBG" "4-UDFN (1.0x1.0)" 364.28,333.92 r180 bottom locked
U9 "LP87524JRNFRQ1" "26-VQFN-HR (4.5x4)" 277.21,888.41 r180 top locked
U10 "AWR1843ARBGALPQ1" "180-FCBGA (15X15)" 1051.46,453.26 r180 top locked
U11 "MX25V1635FZNQ03" "8-WSON 6x5-mm" 1582.31,338.93 r270 bottom locked
U13 "STM32L433RCT6" "64-LQFP (10x10)" 972.62,1042.61 r180 top locked
X1 "40 MHz" SMD2016-4P 1100.83,50.49 r180 top locked
X2 "32.768kHz" SMD1610-2P 1285,877.06 r90 top locked
X3 "8.0000MHZ" SMD3225-4P 1336,997.4 r90 top locked

## Footprints (in the part's own frame and the unit in brackets; to place one, negate y for a bottom-side part, rotate by r counter-clockwise, add the part's x,y. Pads: shape width x height; smd on the part's side, far side on the other; paste and mask are expansions set on the pad)
"2 Test Pad" [mil]
  oct 45x60 smd: 1(0,0) 2(78.74,0)
  silkscreen extent -29,-36 108,36
"4-UDFN (1.0x1.0)" [mm]
  rect 0.1x0.1 smd paste-1 mask+0: 1(0,0) 2(0.65,0) 3(0.65,1) 4(0,1)
  rect 0.58x0.58 smd rot 45: 5(0.325,0.5)
  Top Layer region: 0.15,0.08 0.15,-0.15 -0.15,-0.15 -0.15,0.38
  Top Layer region: 0.8,-0.15 0.5,-0.15 0.5,0.08 0.7,0.28 0.8,0.28
  Top Layer region: 0.8,0.72 0.7,0.72 0.5,0.92 0.5,1.15 0.8,1.15
  Top Layer region: 0.15,0.92 -0.05,0.72 -0.15,0.72 -0.15,1.15 0.15,1.15
  silkscreen extent -0.26,-0.28 0.91,1.06, body extent -0.17,0 0.82,1, height 0.58
5-VSOF [mm]
  rect 0.35x0.25 smd: 1(-0.675,0.5) 2(-0.675,0) 3(-0.675,-0.5) 4(0.675,-0.5) 5(0.675,0.5)
  silkscreen extent -1.12,-0.86 0.51,0.86, body extent -0.8,-0.82 0.8,0.82, height 0.6
"8-WSON 6x5-mm" [mm]
  rect 0.65x0.45 smd: 1(-2.7,1.905) 2(-2.7,0.635) 3(-2.7,-0.635) 4(-2.7,-1.905) 5(2.7,-1.905) 6(2.7,-0.635) 7(2.7,0.635) 8(2.7,1.905)
  rect 3.4x4 smd: 9(0,0)
  silkscreen extent -3.3,-2.54 3.07,2.54, body extent -3.01,-2.5 3.01,2.5, height 0.77
"10-VSON (3x3)" [mm]
  rect 0.62x0.26 smd: 1(-1.475,1) 2(-1.475,0.5) 3(-1.475,0) 4(-1.475,-0.5) 5(-1.475,-1) 6(1.475,-1) 7(1.475,-0.5) 8(1.475,0) 9(1.475,0.5) 10(1.475,1)
  round 0.5 hole 0.3: 11(-0.575,0) 11(0,-0.95) 11(0,0.95) 11(0.575,0)
  rect 0.25x0.55 smd: 11(-0.25,-1.45) 11(-0.25,1.45) 11(0.25,-1.45) 11(0.25,1.45)
  rect 1.65x2.4 smd: 11(0,0)
  silkscreen extent -2.08,-1.55 1.55,1.55, body extent -1.5,-1.5 1.5,1.5, height 1
"16-QFN (3x3)." [mm]
  rect 0.7x0.25 smd: 1(-1.45,0.75) 2(-1.45,0.25) 3(-1.45,-0.25) 4(-1.45,-0.75) 9(1.45,-0.75) 10(1.45,-0.25) 11(1.45,0.25) 12(1.45,0.75)
  rect 0.25x0.7 smd: 5(-0.75,-1.45) 6(-0.25,-1.45) 7(0.25,-1.45) 8(0.75,-1.45) 13(0.75,1.45) 14(0.25,1.45) 15(-0.25,1.45) 16(-0.75,1.45)
  rect 1.7x1.7 smd: 17(0,0)
  silkscreen extent -2.08,-1.6 1.6,1.6, body extent -1.55,-1.55 1.55,1.55, height 0.99
"26-VQFN-HR (4.5x4)" [mm] "QFN, 26-Leads, Body 4x4.5mm, Pitch 0.5mm"
  rect 0.6x0.4 smd paste-0.3 mask+0.05: 1(-1.9,1.825) 8(-1.9,-1.825) 14(1.9,-1.825) 21(1.9,1.825)
  rect 0.6x0.25 smd paste+0 mask+0.05: 2(-1.9,1.25) 3(-1.9,0.75) 4(-1.9,0.25) 5(-1.9,-0.25) 6(-1.9,-0.75) 7(-1.9,-1.25) 15(1.9,-1.25) 16(1.9,-0.75) 17(1.9,-0.25) 18(1.9,0.25) 19(1.9,0.75) 20(1.9,1.25)
  rect 0.25x1.82 smd paste-1 mask+0.05: 9(-1,-1.54) 10(-0.5,-1.54) 11(0,-1.54) 12(0.5,-1.54) 13(1,-1.54) 22(1,1.54) 23(0.5,1.54) 24(0,1.54) 25(-0.5,1.54) 26(-1,1.54)
  rect 2.24x0.66 smd paste-1 mask+0.05: 27(0,0)
  rrect33% 0.6x0.3 on Top Paste: ""(-1.9,1.775) ""(-1.9,-1.775) ""(1.9,1.775) ""(1.9,-1.775)
  rrect33% 0.3x0.825 on Top Paste: ""(-1.575,2.038) ""(-1.575,-2.038) ""(1.575,2.038) ""(1.575,-2.038)
  rrect40% 0.25x0.81 on Top Paste: ""(-1,1.035) ""(-1,2.045) ""(-1,-2.045) ""(-1,-1.035) ""(-0.5,2.045) ""(-0.5,1.035) ""(-0.5,-1.035) ""(-0.5,-2.045) ""(0,2.045) ""(0,1.035) ""(0,-1.035) ""(0,-2.045) ""(0.5,2.045) ""(0.5,1.035) ""(0.5,-1.035) ""(0.5,-2.045) ""(1,1.035) ""(1,2.045) ""(1,-2.045) ""(1,-1.035)
  rrect15% 0.98x0.66 on Top Paste: ""(-0.59,0) ""(0.59,0)
  Top Layer region: -1.775,1.675 -1.775,2.4 -1.771,2.419 -1.76,2.435 -1.744,2.446 -1.725,2.45 -1.725,2.45 -1.475,2.45 -1.456,2.446 -1.44,2.435 -1.429,2.419 -1.425,2.4 -1.425,2.4 -1.425,1.675 -1.429,1.656 -1.44,1.64 -1.456,1.629 -1.475,1.625 -1.475,1.625 -1.725,1.625 -1.744,1.629 -1.76,1.64 -1.771,1.656 -1.775,1.675
  Top Layer region: 1.425,1.675 1.425,2.4 1.429,2.419 1.44,2.435 1.456,2.446 1.475,2.45 1.475,2.45 1.725,2.45 1.744,2.446 1.76,2.435 1.771,2.419 1.775,2.4 1.775,2.4 1.775,1.675 1.771,1.656 1.76,1.64 1.744,1.629 1.725,1.625 1.725,1.625 1.475,1.625 1.456,1.629 1.44,1.64 1.429,1.656 1.425,1.675
  Top Layer region: 1.425,-2.4 1.425,-1.675 1.429,-1.656 1.44,-1.64 1.456,-1.629 1.475,-1.625 1.475,-1.625 1.725,-1.625 1.744,-1.629 1.76,-1.64 1.771,-1.656 1.775,-1.675 1.775,-1.675 1.775,-2.4 1.771,-2.419 1.76,-2.435 1.744,-2.446 1.725,-2.45 1.725,-2.45 1.475,-2.45 1.456,-2.446 1.44,-2.435 1.429,-2.419 1.425,-2.4
  Top Layer region: -1.775,-2.4 -1.775,-1.675 -1.771,-1.656 -1.76,-1.64 -1.744,-1.629 -1.725,-1.625 -1.725,-1.625 -1.475,-1.625 -1.456,-1.629 -1.44,-1.64 -1.429,-1.656 -1.425,-1.675 -1.425,-1.675 -1.425,-2.4 -1.429,-2.419 -1.44,-2.435 -1.456,-2.446 -1.475,-2.45 -1.475,-2.45 -1.725,-2.45 -1.744,-2.446 -1.76,-2.435 -1.771,-2.419 -1.775,-2.4
  silkscreen extent -2.44,-2.34 2.08,2.34, body extent -2,-2.25 2,2.25, height 0.9
"64-LQFP (10x10)" [mm]
  rect 1.2x0.3 smd: 1(-5.75,3.75) 2(-5.75,3.25) 3(-5.75,2.75) 4(-5.75,2.25) 5(-5.75,1.75) 6(-5.75,1.25) 7(-5.75,0.75) 8(-5.75,0.25) 9(-5.75,-0.25) 10(-5.75,-0.75) 11(-5.75,-1.25) 12(-5.75,-1.75) 13(-5.75,-2.25) 14(-5.75,-2.75) 15(-5.75,-3.25) 16(-5.75,-3.75) 33(5.75,-3.75) 34(5.75,-3.25) 35(5.75,-2.75) 36(5.75,-2.25) 37(5.75,-1.75) 38(5.75,-1.25) 39(5.75,-0.75) 40(5.75,-0.25) 41(5.75,0.25) 42(5.75,0.75) 43(5.75,1.25) 44(5.75,1.75) 45(5.75,2.25) 46(5.75,2.75) 47(5.75,3.25) 48(5.75,3.75)
  rect 0.3x1.2 smd: 17(-3.75,-5.75) 18(-3.25,-5.75) 19(-2.75,-5.75) 20(-2.25,-5.75) 21(-1.75,-5.75) 22(-1.25,-5.75) 23(-0.75,-5.75) 24(-0.25,-5.75) 25(0.25,-5.75) 26(0.75,-5.75) 27(1.25,-5.75) 28(1.75,-5.75) 29(2.25,-5.75) 30(2.75,-5.75) 31(3.25,-5.75) 32(3.75,-5.75) 49(3.75,5.75) 50(3.25,5.75) 51(2.75,5.75) 52(2.25,5.75) 53(1.75,5.75) 54(1.25,5.75) 55(0.75,5.75) 56(0.25,5.75) 57(-0.25,5.75) 58(-0.75,5.75) 59(-1.25,5.75) 60(-1.75,5.75) 61(-2.25,5.75) 62(-2.75,5.75) 63(-3.25,5.75) 64(-3.75,5.75)
  silkscreen extent -6.63,-5.36 5.28,5.36, body extent -6,-6 6,6, height 1.6
"180-FCBGA (15X15)" [mm]
  round 0.4 smd paste+0 mask-1000: A1(-6.8,6.8) A2(-6,6.8) A3(-5.2,6.8) A4(-4.4,6.8) A5(-3.6,6.8) A6(-2.8,6.8) A7(-2,6.8) A8(-1.2,6.8) A9(-0.4,6.8) A10(0.4,6.8) A11(1.2,6.8) A12(2,6.8) A13(2.8,6.8) A14(3.6,6.8) A15(4.4,6.8) A16(5.2,6.8) A17(6,6.8) A18(6.8,6.8) B1(-6.8,6) B2(-6,6) B3(-5.2,6) B4(-4.4,6) B5(-3.6,6) B6(-2.8,6) B7(-2,6) B8(-1.2,6) B9(-0.4,6) B10(0.4,6) B11(1.2,6) B12(2,6) B13(2.8,6) B14(3.6,6) B15(4.4,6) B16(5.2,6) B17(6,6) B18(6.8,6) C1(-6.8,5.2) C2(-6,5.2) C3(-5.2,5.2) C4(-4.4,5.2) C5(-3.6,5.2) C6(-2.8,5.2) C7(-2,5.2) C8(-1.2,5.2) C9(-0.4,5.2) C10(0.4,5.2) C11(1.2,5.2) C12(2,5.2) C13(2.8,5.2) C14(3.6,5.2) C15(4.4,5.2) C16(5.2,5.2) C17(6,5.2) C18(6.8,5.2) D1(-6.8,4.4) D2(-6,4.4) D3(-5.2,4.4) D16(5.2,4.4) D17(6,4.4) D18(6.8,4.4) E1(-6.8,3.6) E2(-6,3.6) E3(-5.2,3.6) E16(5.2,3.6) E17(6,3.6) E18(6.8,3.6) F1(-6.8,2.8) F2(-6,2.8) F3(-5.2,2.8) F16(5.2,2.8) F17(6,2.8) F18(6.8,2.8) G1(-6.8,2) G2(-6,2) G3(-5.2,2) G16(5.2,2) G17(6,2) G18(6.8,2) H1(-6.8,1.2) H2(-6,1.2) H3(-5.2,1.2) H16(5.2,1.2) H17(6,1.2) H18(6.8,1.2) J1(-6.8,0.4) J2(-6,0.4) J3(-5.2,0.4) J16(5.2,0.4) J17(6,0.4) J18(6.8,0.4) K1(-6.8,-0.4) K2(-6,-0.4) K3(-5.2,-0.4) K16(5.2,-0.4) K17(6,-0.4) K18(6.8,-0.4) L1(-6.8,-1.2) L2(-6,-1.2) L3(-5.2,-1.2) L16(5.2,-1.2) L17(6,-1.2) L18(6.8,-1.2) M1(-6.8,-2) M2(-6,-2) M3(-5.2,-2) M16(5.2,-2) M17(6,-2) M18(6.8,-2) N1(-6.8,-2.8) N2(-6,-2.8) N3(-5.2,-2.8) N16(5.2,-2.8) N17(6,-2.8) N18(6.8,-2.8) P1(-6.8,-3.6) P2(-6,-3.6) P3(-5.2,-3.6) P16(5.2,-3.6) P17(6,-3.6) P18(6.8,-3.6) R1(-6.8,-4.4) R2(-6,-4.4) R3(-5.2,-4.4) R16(5.2,-4.4) R17(6,-4.4) R18(6.8,-4.4) T1(-6.8,-5.2) T2(-6,-5.2) T3(-5.2,-5.2) T4(-4.4,-5.2) T5(-3.6,-5.2) T6(-2.8,-5.2) T7(-2,-5.2) T8(-1.2,-5.2) T9(-0.4,-5.2) T10(0.4,-5.2) T11(1.2,-5.2) T12(2,-5.2) T13(2.8,-5.2) T14(3.6,-5.2) T15(4.4,-5.2) T16(5.2,-5.2) T17(6,-5.2) T18(6.8,-5.2) U1(-6.8,-6) U2(-6,-6) U3(-5.2,-6) U4(-4.4,-6) U5(-3.6,-6) U6(-2.8,-6) U7(-2,-6) U8(-1.2,-6) U9(-0.4,-6) U10(0.4,-6) U11(1.2,-6) U12(2,-6) U13(2.8,-6) U14(3.6,-6) U15(4.4,-6) U16(5.2,-6) U17(6,-6) U18(6.8,-6) V1(-6.8,-6.8) V2(-6,-6.8) V3(-5.2,-6.8) V4(-4.4,-6.8) V5(-3.6,-6.8) V6(-2.8,-6.8) V7(-2,-6.8) V8(-1.2,-6.8) V9(-0.4,-6.8) V10(0.4,-6.8) V11(1.2,-6.8) V12(2,-6.8) V13(2.8,-6.8) V14(3.6,-6.8) V15(4.4,-6.8) V16(5.2,-6.8) V17(6,-6.8) V18(6.8,-6.8)
  silkscreen extent -7.85,-7.55 7.55,7.55, body extent -7.49,-7.49 7.51,7.51, height 0.9
20021121-00010C4LF_ [mm]
  rect 0.76x2.4 smd: 1(-2.54,-1.95) 2(-2.54,1.95) 3(-1.27,-1.95) 4(-1.27,1.95) 5(0,-1.95) 6(0,1.95) 7(1.27,-1.95) 8(1.27,1.95) 9(2.54,-1.95) 10(2.54,1.95)
  silkscreen extent -3.43,-2.08 3.23,1.22, body extent -3.17,-2.78 3.18,2.72, height 4.5
B3U-1000P [mm] "SWITCH TACTILE SPST-NO 0.05A 12V"
  rect 0.82x1.72 smd: 1(-1.7,0) 2(1.7,0)
  silkscreen extent -1.57,-1.3 1.57,1.3, body extent -2,-1.26 2,1.24, height 1.6
CAP-0201 [mm]
  rect 0.3x0.3 smd mask+0.055: 1(-0.3,0) 2(0.3,0)
  silkscreen extent -0.53,-0.23 0.53,0.23, body extent -0.3,-0.15 0.3,0.15, height 0.28
Cap-0402 [mil]
  rect 18x25 smd mask+2.36: 1(-18.5,0) 2(18.5,0)
  silkscreen extent -31,-16 31,16, body extent -20,-10 20,10, height 19
Cap-0603 [mil]
  rect 30x35 smd mask+2.36: 1(-30,0) 2(30,0)
  silkscreen extent -49,-21 49,21, body extent -32,-16 31,16, height 34
CAP-0603 [mil]
  rect 30x35 smd mask+2.36: 1(-30,0) 2(30,0)
  silkscreen extent -49,-21 49,21, body extent -32,-16 31,16, height 34
Cap-1206 [mil] "SMD 1206"
  rect 60x70 smd: 1(-50,0) 2(50,0)
  silkscreen extent -84,-39 84,39, body extent -63,-31 63,32, height 39
CL-SB-12B-02T [mm]
  rect 1.2x1.4 smd paste+0 mask+0.051: 1(-2.5,-2.2) 2(0,2.2) 3(2.5,-2.2)
  round 0 hole 0.9 unplated: ""(-3.4,0) ""(3.4,0)
  silkscreen extent -4.25,-2.4 4.25,1.75, body extent -4.25,-2.5 4.25,2.5, height 5.5
"DSBGA-9 (1.651x1.61)" [mm]
  round 0.245 smd mask+0.05: A1(-0.5,0.5) A2(0,0.5) A3(0.5,0.5) B1(-0.5,0) B2(0,0) B3(0.5,0) C1(-0.5,-0.5) C2(0,-0.5) C3(0.5,-0.5)
  silkscreen extent -0.89,-0.84 0.84,0.81, body extent -0.81,-0.79 0.81,0.79, height 0.63
DSIC01LSGET [mm]
  rect 2.2x1 smd mask+0.055: 1(-4.4,0) 2(4.4,0)
  silkscreen extent -2.95,-1.8 2.92,1.8, body extent -4.9,-1.74 4.9,1.74, height 4.36
EVQP7A01P [mm]
  rect 1.4x1.05 smd: 1(-1.8,0.725) 1(1.8,0.725) 2(-1.8,-0.725) 2(1.8,-0.725)
  silkscreen extent -2.36,-1.47 2.29,1.5, body extent -2.35,-2.1 2.35,1.45, height 1.35
HDR1X4_ [mm] "Connector; Header; 4 Position"
  rect 1.6x1.6 hole 0.95: 1(0,0)
  round 1.6 hole 0.95: 2(2.54,0) 3(5.08,0) 4(7.62,0)
  silkscreen extent -1.27,-1.27 8.89,1.27, body extent -1.27,-1.27 8.89,1.27, height 9.5
"IND-0603 (1608 Metric)" [mm] "0.063\" L x 0.032\" W (1.60mm x 0.80mm)"
  rect 0.6x0.8 smd: 1(-0.7,0) 2(0.7,0)
  silkscreen extent -0.2,-0.46 0.23,0.46, body extent -0.8,-0.4 0.8,0.4, height 0.78
"IND-1008 (2520 Metric)" [mm]
  rect 0.65x2.2 smd: 1(-0.95,0) 2(0.95,0)
  silkscreen extent -0.41,-1.04 0.41,1.04, body extent -1.25,-1 1.25,1, height 1.2
IND-1206 [mm]
  rect 1.4x1.82 smd: 1(-1.36,0) 2(1.36,0)
  silkscreen extent -0.34,-0.85 0.34,0.85, body extent -1.6,-0.8 1.6,0.8, height 1.3
LED-0402 [mm]
  rect 0.62x0.72 smd: 1(-0.475,0) 2(0.475,0)
  silkscreen extent -0.89,-0.51 1.55,0.51, body extent -0.5,-0.25 0.51,0.25, height 0.45
Res-0201 [mm]
  rect 0.27x0.37 smd mask+0.055: 1(-0.275,0) 2(0.275,0)
  silkscreen extent -0.48,-0.25 0.48,0.25, body extent -0.3,-0.15 0.3,0.15, height 0.29
Res-0402 [mil]
  rect 18x25 smd mask+2.17: 1(-18.5,0) 2(18.5,0)
  silkscreen extent -32,-17 32,16, body extent -23,-11 23,11, height 16
Res-0603 [mil]
  rect 30x35 smd: 1(-30,0) 2(30,0)
  silkscreen extent -48,-21 48,21, body extent -31,-17 31,17, height 18
RES-0805 [mil] "SMD 0805"
  rect 40x50 smd: 1(-40,0) 2(40,0)
  silkscreen extent -64,-29 64,29, body extent -39,-25 39,24, height 24
Res-1206 [mil]
  rect 60x70 smd: 1(-50,0) 2(50,0)
  silkscreen extent -84,-39 84,39, body extent -63,-31 63,31, height 24
SM10B-SRSS-TB(LF)(SN) [mm]
  rect 0.6x1.55 smd paste+0: 1(-4.5,1.938) 2(-3.5,1.938) 3(-2.5,1.938) 4(-1.5,1.938) 5(-0.5,1.938) 6(0.5,1.938) 7(1.5,1.938) 8(2.5,1.938) 9(3.5,1.938) 10(4.5,1.938)
  rect 1.2x1.8 smd paste+0: MP1(-5.8,-1.938) MP2(5.8,-1.938)
  silkscreen extent -6.1,-2.97 6,2.13, body extent -5.99,-2.61 6.01,2.34, height 2.96
SMA(DO-214AC) [mm]
  rect 1.6x2.8 smd: 1(-1.9,0) 2(1.9,0)
  silkscreen extent -3.66,-1.6 2.84,1.6, body extent -2.6,-1.45 2.6,1.45, height 2.3
SMD1610-2P [mm]
  rect 0.5x1 smd: 1(-0.55,0) 2(0.55,0)
  silkscreen extent -0.13,-0.53 0.13,0.53, body extent -0.8,-0.5 0.8,0.5, height 0.5
SMD2016-4P [mm]
  rect 1x0.8 smd paste+0 mask+0.051: 1(-0.75,-0.6) 2(0.75,-0.6) 3(0.75,0.6) 4(-0.75,0.6)
  silkscreen extent -1.42,-0.84 1.04,0.84, body extent -1,-0.8 1,0.8, height 0.47
SMD3225-4P [mm]
  rect 1.4x1.2 smd: 1(-1.1,-0.85) 2(1.1,-0.85) 3(1.1,0.85) 4(-1.1,0.85)
  silkscreen extent -2.08,-1.3 1.65,1.3, body extent -1.6,-1.25 1.6,1.25, height 0.81
SMD5050 [mm]
  rect 1.6x1 smd: 1(-2.4,1.6) 2(-2.4,0) 3(-2.4,-1.6) 4(2.4,-1.6) 5(2.4,0) 6(2.4,1.6)
  silkscreen extent -3.51,-2.57 2.49,2.57, body extent -2.66,-2.5 2.74,2.5, height 1.62
SOP-8 [mm]
  rect 1.3x0.7 smd: 1(-2.75,1.905) 2(-2.75,0.635) 3(-2.75,-0.635) 4(-2.75,-1.905) 5(2.75,-1.905) 6(2.75,-0.635) 7(2.75,0.635) 8(2.75,1.905)
  silkscreen extent -3.69,-2.57 2.03,2.57, body extent -3.1,-2.5 3.1,2.5, height 1.76
SOT-23 [mm] "TRANS NPN 40V 0.6A SOT23"
  rect 0.82x0.92 smd: 1(-0.95,-1) 2(0.95,-1) 3(0,1)
  silkscreen extent -1.68,-1.3 1.55,0.81, body extent -1.5,-1.25 1.5,1.25, height 1.05
SOT-583 [mm]
  rect 0.67x0.32 smd mask+0.055: 1(-0.735,0.75) 2(-0.735,0.25) 3(-0.735,-0.25) 4(-0.735,-0.75) 5(0.735,-0.75) 6(0.735,-0.25) 7(0.735,0.25) 8(0.735,0.75)
  silkscreen extent -1.32,-1.1 0.6,1.1, body extent -0.8,-1.05 0.8,1.05, height 0.6
SOT-723 [mm]
  rect 0.5x0.45 smd: 1(-0.4,-0.575) 2(0.4,-0.575) 3(0,0.575)
  silkscreen extent -0.94,-0.66 0.63,0.63, body extent -0.6,-0.6 0.6,0.6, height 0.5
Test-point [mil]
  oct 60x60 smd: 1(0,0)
  silkscreen extent -37,-37 37,37
TSOT-23-6 [mm]
  rect 1x0.6 smd: 1(-1.2,0.95) 2(-1.2,0) 3(-1.2,-0.95) 4(1.2,-0.95) 5(1.2,0) 6(1.2,0.95)
  silkscreen extent -1.98,-1.5 0.86,1.5, body extent -1.41,-1.45 1.41,1.45, height 1
TYPE-C-31-M-12_ [mm]
  rect 0.6x1.2 smd: A1/B12(-3.2,2.375) A4/B9(-2.4,2.375) B1/A12(3.2,2.375) B4/A9(2.4,2.375)
  rect 0.3x1.2 smd: A5(-1.25,2.375) A6(-0.25,2.375) A7(0.25,2.375) A8(1.25,2.375) B5(1.75,2.375) B6(0.75,2.375) B7(-0.75,2.375) B8(-1.75,2.375)
  round 0 hole 0.62 unplated: MH(-2.89,1.305) MH(2.89,1.305)
  oval 0.9x2 hole 0.6 slot 1.7 at 90 deg: S1(4.325,1.805) S4(-4.325,1.805)
  oval 0.9x1.7 hole 0.6 slot 1.4 at 90 deg: S2(4.325,-2.375) S3(-4.325,-2.375)
  silkscreen extent -4.5,-3.57 4.5,0.44, body extent -4.47,-5.01 4.47,2.89, height 3.31
WPN4020H1R0MT_ [mm]
  rect 1.1x3.7 smd: 1(-1.5,0) 2(1.5,0)
  silkscreen extent -1.88,-2.03 1.88,2.03, body extent -2,-2 2,2, height 2

## Part data
C1 C46 C47 C51 C53 C79 C80 C96 C97 C98 C99 C104 C105 C107 C109: library part CC0402JRX7R7BB104, "CAP CER 0.1UF 16V X7R 0402", Case Code (Imperial)=0402, Case Code (Metric)=1005, Dielectric=X7R, LCSC Part Number=C541464, Manufacturer=Yageo, Max Operating Temperature=125°C, Min Operating Temperature=-55°C, Package Quantity=10000, Supplier Part Number=311-1676-1-ND, Tolerance=5%, Voltage Rating=16V, Case/Package=0402, Category="Ceramic Capacitors", ComponentLink1Description=https://datasheet.ciiva.com/13210/upy-gphc-x7r-6-3v-to-50v-8-12304-13210152.pdf?src-supplier=Mouser, ComponentLink1URL=https://datasheet.ciiva.com/13210/upy-gphc-x7r-6-3v-to-50v-8-12304-13210152.pdf?src-supplier=Mouser, Construction=Flat, Halogen Free="Halogen Free", Height=0.5mm, Item Type=Capacitor, Lead Free="Lead Free", Length=0.039inch, Manufacturer Part Number=CC0402JRX7R7BB104, Material=4241ConductorMaterial, Mounting Technology="Surface Mount", Packaging="Tape and Reel", Pricing="1=0.1, 10=0.046, 50=0.0262, 100=0.0203, 500=0.01528, 1000=0.012, 2500=0.01091, 5000=0.01004 (USD)", RoHS=Yes, RoHS Compliant=Yes, Series=CC, Stock=1659111, Supplier=Digikey, Thickness=0.022inch, Voltage Rating (DC)=16V, Width=0.02inch
C2 C3 C14 C23 C25 C26 C27 C28 C29 C30 C32 C52 C54 C57 C61 C65 C69 C73 C76 C90: library part CC0603KRX5R7BB106, "CAP CER 10UF 16V X5R 0603", Case Code (Imperial)=0603, Case Code (Metric)=1608, LCSC Part Number=C2936601, Manufacturer=Yageo, Max Operating Temperature=85°C, Min Operating Temperature=-55°C, Supplier Part Number 1=311-3486-1-ND, Tolerance=10%, Voltage Rating=16V, Capacitance=10uF, Case/Package=0603, Category="Ceramic Capacitors", ComponentLink1Description=http://www.yageo.com/documents/recent/UPY-GPHC_X5R_4V-to-50V_25.pdf?src-supplier=Digi-Key, ComponentLink1URL=http://www.yageo.com/documents/recent/UPY-GPHC_X5R_4V-to-50V_25.pdf?src-supplier=Digi-Key, Item Type=Capacitor, Manufacturer Part Number=CC0603KRX5R7BB106, Mount="Surface Mount", Packaging="Cut Tape", Pricing 1="1=0.68000, 10=0.48000, 50=0.36300, 100=0.31610, 500=0.23416, 1000=0.19903 (USD)", RoHS=Yes, RoHS Compliant=Yes, Stock 1=240725, Supplier 1=Digi-Key
C4 C11 C18 C19 C20 C21 C50 C58 C60 C102: library part CC0402KRX5R7BB105, "CAP CER 1UF 16V X5R 0402", Case Code (Imperial)=0402, Case Code (Metric)=1005, Dielectric=X5R, LCSC Part Number=C325464, Manufacturer=Yageo, Max Operating Temperature=85°C, Min Operating Temperature=-55°C, Supplier Part Number 1=311-1691-6-ND, Tolerance=10%, Voltage Rating=16V, Capacitance=1uF, Case/Package=0402, ComponentLink1Description=http://www.yageo.com/documents/recent/UPY-GPHC_X5R_4V-to-50V_12.pdf?src-supplier=Avnet+Europe, ComponentLink1URL=http://www.yageo.com/documents/recent/UPY-GPHC_X5R_4V-to-50V_12.pdf?src-supplier=Avnet+Europe, Composition=Ceramic, Depth=0.5mm, Halogen Free="Halogen Free", Height=0.5mm, Item Type=Capacitor, Lead Free="Lead Free", Length=1mm, Manufacturer Part Number=CC0402KRX5R7BB105, Mount="Surface Mount", Packaging="Tape and Reel", Pricing 1="1=0.36, 10=0.252, 100=0.1512, 500=0.1134, 1000=0.09576, 2500=0.09072, 5000=0.08568 (USD)", Radiation Hardening=No, Stock 1=1405667, Supplier 1=Digi-Key, Termination=SMD/SMT, Thickness=0.022inch, Voltage Rating (DC)=16V, Weight=2.3E-05oz, Width=0.02inch
C5 C7 C8 C9: library part CC0603MRX5R6BB226, "CAP CER 22UF 10V X5R 0603", Case Code (Imperial)=0603, Case Code (Metric)=1608, Dielectric=X5R, LCSC Part Number=C109447, Manufacturer=Yageo, Max Operating Temperature=85°C, Min Operating Temperature=-55°C, Package Quantity=4000, Supplier Part Number 1=311-1819-1-ND, Tolerance=20%, Voltage Rating=10V, Capacitance=22uF, Case/Package=0603, Category="Ceramic Capacitors", ComponentLink1Description=http://www.mouser.com/ds/2/447/Yageo_UPY-GP_NP0_16V-to-50V_9-358835.pdf?src-supplier=Mouser, ComponentLink1URL=http://www.mouser.com/ds/2/447/Yageo_UPY-GP_NP0_16V-to-50V_9-358835.pdf?src-supplier=Mouser, ComponentLink2Description=http://www.yageo.com/documents/recent/UPY-GPHC_X5R_4V-to-50V_25.pdf?src-supplier=Digi-Key, ComponentLink2URL=http://www.yageo.com/documents/recent/UPY-GPHC_X5R_4V-to-50V_25.pdf?src-supplier=Digi-Key, Halogen Free="Halogen Free", Height=0.8mm, Item Type=Capacitor, Lead Free="Lead Free", Length=0.063inch, Manufacturer Part Number=CC0603MRX5R6BB226, Mount="Surface Mount", Packaging="Tape and Reel", Pricing 1="1=0.68000, 10=0.48000, 50=0.36300, 100=0.31610, 500=0.23416, 1000=0.19903 (USD)", RoHS=Yes, RoHS Compliant=Yes, Stock 1=19628, Supplier 1=Digi-Key, Termination=SMD/SMT, Thickness=0.035inch, Voltage Rating (DC)=10V, Weight=7.1E-05oz, Width=0.8mm
C6 C12 C15 C17 C55 C56 C81 C87: library part CC0603KRX5R8BB225, "CAP CER 2.2UF 25V X5R 0603", Case Code (Imperial)=0603, Case Code (Metric)=1608, Dielectric=X5R, LCSC Part Number=C309478, Manufacturer=Yageo, Max Operating Temperature=85°C, Min Operating Temperature=-55°C, Package Quantity=4000, Resistor Type=Ceramic, Supplier Part Number 1=311-1786-1-ND, Tolerance=10%, Voltage Rating=25V, Capacitance=2.2uF, Case/Package=0603, ComponentLink1Description=https://www.verical.com/server-webapp/html/getDatasheet?partID=782757&src-supplier=Verical, ComponentLink1URL=https://www.verical.com/server-webapp/html/getDatasheet?partID=782757&src-supplier=Verical, Depth=0.8mm, Halogen Free="Halogen Free", Item Type=Capacitor, Lead Free="Lead Free", Length=1.6mm, Manufacturer Part Number=CC0603KRX5R8BB225, Mount="Surface Mount", Packaging="Tape and Reel", Pricing 1="1=0.4, 10=0.276, 50=0.1932, 100=0.1656, 500=0.1242, 1000=0.10488 (USD)", Radiation Hardening=No, RoHS Compliant=Yes, Stock 1=687936, Supplier 1=Digi-Key, Termination=SMD/SMT, Thickness=0.037inch, Voltage Rating (DC)=25V, Weight=7.1E-05oz, Width=0.031inch
C10 C103: library part CC0402KRX7R8BB103, "CAP CER 10000PF 25V X7R 0402", Case Code (Imperial)=0402, Case Code (Metric)=1005, Dielectric=X7R, LCSC Part Number=C327025, Manufacturer=Yageo, Max Operating Temperature=125°C, Min Operating Temperature=-55°C, Package Quantity=1, Supplier Part Number 1=311-1337-1-ND, Tolerance=10%, Voltage Rating=25V, Capacitance=10nF, Case/Package=0402, ComponentLink1Description=http://www.yageo.com/documents/recent/UPY-GPHC_X7R_6.3V-to-50V_18.pdf?src-supplier=Digi-Key, ComponentLink1URL=http://www.yageo.com/documents/recent/UPY-GPHC_X7R_6.3V-to-50V_18.pdf?src-supplier=Digi-Key, ComponentLink2Description=https://www.verical.com/server-webapp/html/getDatasheet?partID=375418&src-supplier=Verical, ComponentLink2URL=https://www.verical.com/server-webapp/html/getDatasheet?partID=375418&src-supplier=Verical, ComponentLink3Description=http://www.yageo.com/documents/recent/UPY-GPHC_X7R_6.3V-to-50V_8.pdf?src-supplier=Avnet, ComponentLink3URL=http://www.yageo.com/documents/recent/UPY-GPHC_X7R_6.3V-to-50V_8.pdf?src-supplier=Avnet, ComponentLink4Description=https://4donline.ihs.com/images/VipMasterIC/IC/YAGO/YAGO-S-A0003557223/YAGO-S-A0003557223-1.pdf?hkey=52A5661711E402568146F3353EA87419&src-supplier=Element14, ComponentLink4URL=https://4donline.ihs.com/images/VipMasterIC/IC/YAGO/YAGO-S-A0003557223/YAGO-S-A0003557223-1.pdf?hkey=52A5661711E402568146F3353EA87419&src-supplier=Element14, ComponentLink5Description=http://www.farnell.com/datasheets/2167236.pdf?src-supplier=Element14, ComponentLink5URL=http://www.farnell.com/datasheets/2167236.pdf?src-supplier=Element14, ComponentLink6Description=http://www.mouser.com/ds/2/447/Yageo_UPY-GP_NP0_16V-to-50V_9-358835.pdf?src-supplier=Mouser, ComponentLink6URL=http://www.mouser.com/ds/2/447/Yageo_UPY-GP_NP0_16V-to-50V_9-358835.pdf?src-supplier=Mouser, Composition=Ceramic, Depth=0.5mm, Halogen Free="Halogen Free", Height=0.5mm, Lead Free="Lead Free", Length=1mm, Manufacturer Part Number=CC0402KRX7R8BB103, Mount="Surface Mount", Packaging="Tape and Reel", Pricing 1="1=0.1, 10=0.021, 100=0.0093, 500=0.00666, 1000=0.00523, 2500=0.00476, 5000=0.00438 (USD)", Radiation Hardening=No, REACH SVHC=Unknown, Stock 1=0, Supplier 1=Digi-Key, Termination=SMD/SMT, Thickness=0.022inch, Voltage Rating (DC)=25V, Width=0.02inch
C13 C59: library part CC0402KRX7R9BB473, "CAP CER 0.047UF 50V X7R 0402", Case Code (Imperial)=0402, Case Code (Metric)=1005, Dielectric=1511DielectricType, LCSC Part Number=C272875, Manufacturer=Yageo, Max Operating Temperature=125°C, Min Operating Temperature=-55°C, Supplier Part Number=2095687, Temperature Coefficient=30ppm/°C, Tolerance=10%, Voltage Rating=50V, Case/Package=0402, Category="Ceramic Capacitors", ComponentLink1Description=https://datasheet.octopart.com/CC0402KRX7R9BB473-Yageo-datasheet-166511530.pdf?src-supplier=Future+Electronics, ComponentLink1URL=https://datasheet.octopart.com/CC0402KRX7R9BB473-Yageo-datasheet-166511530.pdf?src-supplier=Future+Electronics, ComponentLink2Description=http://www.yageo.com/documents/recent/UPY-GPHC_X7R_6.3V-to-50V_18.pdf?src-supplier=Digikey, ComponentLink2URL=http://www.yageo.com/documents/recent/UPY-GPHC_X7R_6.3V-to-50V_18.pdf?src-supplier=Digikey, ComponentLink3Description=https://datasheet.octopart.com/CC0402KRX7R9BB473-Yageo-datasheet-140260305.pdf?src-supplier=Newark, ComponentLink3URL=https://datasheet.octopart.com/CC0402KRX7R9BB473-Yageo-datasheet-140260305.pdf?src-supplier=Newark, Halogen Free=5694HalogenFree, Height=550um, Item Type=Capacitor, Lead Free=5697LeadFree, Length=0.039inch, Manufacturer Part Number=CC0402KRX7R9BB473, Material=4241ConductorMaterial, Mounting Technology="Surface Mount", Packaging="Tape and Reel", Pricing="10000=0.0044, 40000=0.0042, 100000=0.004, 150000=0.0041, 250000=0.0039, 400000=0.0037, 500000=0.0038 (USD)", RoHS=Yes, RoHS Compliant=Yes, Series=CC, Stock=1130000, Supplier="Future Electronics", Thickness=0.022inch, Voltage Rating (DC)=50V, Width=0.02inch
C16: library part CC0201KRX5R8BB102, "CAP CER 1000PF 25V X5R 0201", Case/Package=0201, Dielectric=X5R, LCSC Part Number=C541213, Manufacturer=Yageo, Max Operating Temperature=85°C, Min Operating Temperature=-55°C, Supplier Part Number 1=603-CC0201KR8BB102, Tolerance=10%, Voltage Rating=25V, Capacitance=1nF, Category="Ceramic Capacitors", ComponentLink1Description=http://www.yageo.com/documents/recent/UPY-GPHC_X5R_4V-to-50V_25.pdf?src-supplier=Digi-Key, ComponentLink1URL=http://www.yageo.com/documents/recent/UPY-GPHC_X5R_4V-to-50V_25.pdf?src-supplier=Digi-Key, ComponentLink2Description=https://www.yageo.com/upload/media/product/productsearch/datasheet/mlcc/UPY-GPHC_X5R_4V-to-50V_25.pdf?src-supplier=Digi-Key, ComponentLink2URL=https://www.yageo.com/upload/media/product/productsearch/datasheet/mlcc/UPY-GPHC_X5R_4V-to-50V_25.pdf?src-supplier=Digi-Key, ComponentLink3Description=http://www.yageo.com/exep/pages/download/literatures/ProductSelectionGuide%202014_Final_2.pdf?src-supplier=Digi-Key, ComponentLink3URL=http://www.yageo.com/exep/pages/download/literatures/ProductSelectionGuide%202014_Final_2.pdf?src-supplier=Digi-Key, Halogen Free="Halogen Free", Lead Free="Lead Free", Length=0.024inch, Manufacturer Part Number=CC0201KRX5R8BB102, Mount="Surface Mount", Packaging="Tape and Reel", Pricing 1="1=0.10000, 10=0.02600, 50=0.02600, 100=0.01100, 1000=0.00700, 10000=0.00500 (USD)", RoHS=Yes, RoHS Compliant=Yes, Stock 1=54104, Supplier 1=Mouser, Thickness=0.013inch, Voltage Rating (DC)=25V, Width=0.012inch
C22 C24 C31 C34 C35 C36 C37 C38 C39 C40 C41: library part C3216X5R1E226M160AB, "CAP CER 22UF 25V X5R 1206", Case Code (Imperial)=1206, Case Code (Metric)=3216, Dielectric=X5R, Dielectric Material=Ceramic, LCSC Part Number=C2167811, Manufacturer=TDK, Max Operating Temperature=85°C, Min Operating Temperature=-55°C, Package Quantity=1, Supplier Part Number 1=445-6000-1-ND, Tolerance=20%, Voltage Rating=25V, Capacitance=22uF, Case/Package=1206, ComponentLink1Description=https://product.tdk.com/info/en/documents/chara_sheet/C3216X5R1E226M160AB.pdf?src-supplier=Digi-Key, ComponentLink1URL=https://product.tdk.com/info/en/documents/chara_sheet/C3216X5R1E226M160AB.pdf?src-supplier=Digi-Key, ComponentLink2Description=http://www.mouser.com/ds/2/400/lcc_commercial_general_en-837201.pdf?src-supplier=Mouser, ComponentLink2URL=http://www.mouser.com/ds/2/400/lcc_commercial_general_en-837201.pdf?src-supplier=Mouser, Construction=Flat, Depth=1.6mm, Height=1.6mm, Item Type=Capacitor, Lead Free="Lead Free", Length=3.2mm, Manufacturer Part Number=C3216X5R1E226M160AB, Mount="Surface Mount", Packaging="Tape and Reel", Pricing 1="1=1.08, 10=0.822, 50=0.6832, 100=0.5882, 500=0.4554, 1000=0.39215 (USD)", REACH SVHC="No SVHC", Resistor Type=Ceramic, RoHS Compliant=Yes, Series=C, Stock 1=21442, Supplier 1=Digi-Key, Termination=SMD/SMT, Thickness=0.071inch, Voltage Rating (DC)=25V, Weight=0.000571oz, Width=0.063inch
C33 C62 C63 C64 C66 C67 C68 C70 C71 C72 C74 C75 C77 C78 C82 C83 C84 C85 C86 C88 C89 C91 C92: library part CC0402KRX5R8BB224, "CAP CER 0.22UF 25V X5R 0402", Capacitance=220nF, Case/Package=0402, Dielectric=X5R, LCSC Part Number=C326836, Manufacturer=Yageo, Max Operating Temperature=85°C, Min Operating Temperature=-55°C, Supplier Part Number 1=603-CC402KRX5R8BB224, Tolerance=10%, Voltage Rating=25V, Category="Ceramic Capacitors", ComponentLink1Description=http://www.yageo.com/documents/recent/UPY-GPHC_X5R_4V-to-50V_25.pdf?src-supplier=Digi-Key, ComponentLink1URL=http://www.yageo.com/documents/recent/UPY-GPHC_X5R_4V-to-50V_25.pdf?src-supplier=Digi-Key, ComponentLink2Description=https://www.yageo.com/upload/media/product/productsearch/datasheet/mlcc/UPY-GPHC_X5R_4V-to-50V_26.pdf?src-supplier=Digi-Key, ComponentLink2URL=https://www.yageo.com/upload/media/product/productsearch/datasheet/mlcc/UPY-GPHC_X5R_4V-to-50V_26.pdf?src-supplier=Digi-Key, ComponentLink3Description=http://www.yageo.com/documents/recent/UPY-GPHC_X5R_4V-to-50V_23.pdf?src-supplier=Digi-Key, ComponentLink3URL=http://www.yageo.com/documents/recent/UPY-GPHC_X5R_4V-to-50V_23.pdf?src-supplier=Digi-Key, Halogen Free="Halogen Free", Lead Free="Lead Free", Length=0.039inch, Manufacturer Part Number=CC0402KRX5R8BB224, Mount="Surface Mount", Packaging="Tape and Reel", Pricing 1="1=0.10000, 10=0.03300, 50=0.03300, 100=0.02700, 1000=0.01500, 10000=0.01300 (USD)", RoHS=Yes, RoHS Compliant=Yes, Stock 1=61266, Supplier 1=Mouser, Thickness=0.022inch, Voltage Rating (DC)=25V, Width=0.02inch
C42 C43 C44 C45: library part CGA2B2C0G1H391J050BA, "CAP CER 390PF 50V C0G 0402", Manufacturer=TDK, Supplier Part Number=445-5603-1-ND, ComponentLink1Description=https://datasheet.ciiva.com/24219/cga2b2c0g1h391j050ba-265720-24219960.pdf?src-supplier=Mouser, ComponentLink1URL=https://datasheet.ciiva.com/24219/cga2b2c0g1h391j050ba-265720-24219960.pdf?src-supplier=Mouser, ComponentLink2Description=https://datasheet.ciiva.com/7975/1807242-7975259.pdf?src-supplier=Element14, ComponentLink2URL=https://datasheet.ciiva.com/7975/1807242-7975259.pdf?src-supplier=Element14, Item Type=apacitors, Manufacturer Part Number=CGA2B2C0G1H391J050BA, Pricing="1=0.1, 10=0.048, 50=0.0278, 100=0.0216, 500=0.01622, 1000=0.01275, 2500=0.01159, 5000=0.01066 (USD)", RoHS=Yes, Stock=103846, Supplier=Digikey
C48 C49: library part CC0402BRNPO9BN4R7, "CAP CER 4.7PF 50V C0G/NPO 0402", Case Code (Imperial)=0402, Case Code (Metric)=1005, Dielectric=C0G, LCSC Part Number=C325453, Manufacturer=Yageo, Max Operating Temperature=125°C, Min Operating Temperature=-55°C, Package Quantity=10000, Supplier Part Number=8379141, Voltage Rating=50V, Case/Package=0402, Category="Ceramic Capacitors", ComponentLink1Description=https://datasheet.ciiva.com/11587/upy-gp-np0-16v-to-50v-8-11587134.pdf?src-supplier=Avnet, ComponentLink1URL=https://datasheet.ciiva.com/11587/upy-gp-np0-16v-to-50v-8-11587134.pdf?src-supplier=Avnet, ComponentLink2Description=https://datasheet.ciiva.com/13385/upy-gp-np0-16v-to-50v-8-13385886.pdf?src-supplier=Mouser, ComponentLink2URL=https://datasheet.ciiva.com/13385/upy-gp-np0-16v-to-50v-8-13385886.pdf?src-supplier=Mouser, Depth=0.5mm, Halogen Free=5694HalogenFree, Item Type=Capacitor, Lead Free="Lead Free", Length=1mm, Manufacturer Part Number=CC0402BRNPO9BN4R7, Mounting Technology="Surface Mount", Packaging="Tape and Reel", Pricing="10000=0.0031, 40000=0.0029, 150000=0.0027, 250000=0.0027, 500000=0.0025 (USD)", Radiation Hardening=No, RoHS=Yes, RoHS Compliant=Yes, Series=CC, Stock=80000, Supplier="Future Electronics", Termination=SMD/SMT, Voltage Rating (DC)=50V, Width=0.5mm
C93 C94: library part GJM1555C1H190GB01D, "CAP CER 19PF 50V C0G/NP0 0402", Manufacturer=Murata, Supplier Part Number=81-GJM1555C1H190GB1D, Item Type="Ceramic Capacitors", Manufacturer Part Number=GJM1555C1H190GB01D, Pricing="1=0.13, 10=0.082, 50=0.082, 100=0.042, 1000=0.027, 10000=0.02 (USD)", RoHS=Yes, Stock=2045, Supplier=Mouser